# Altium PCB Can_Gauge_PCB.PcbDoc
Units mm, origin at the board's own origin, x right, y up, seen from the top; angles counter-clockwise.
Board outline 55 x 55 mm, 4 copper layers (Top Layer, Int1, Int2, Bottom Layer), stack 1.51 mm thick; 69 components, 52 nets, 259 pads, 96 vias.
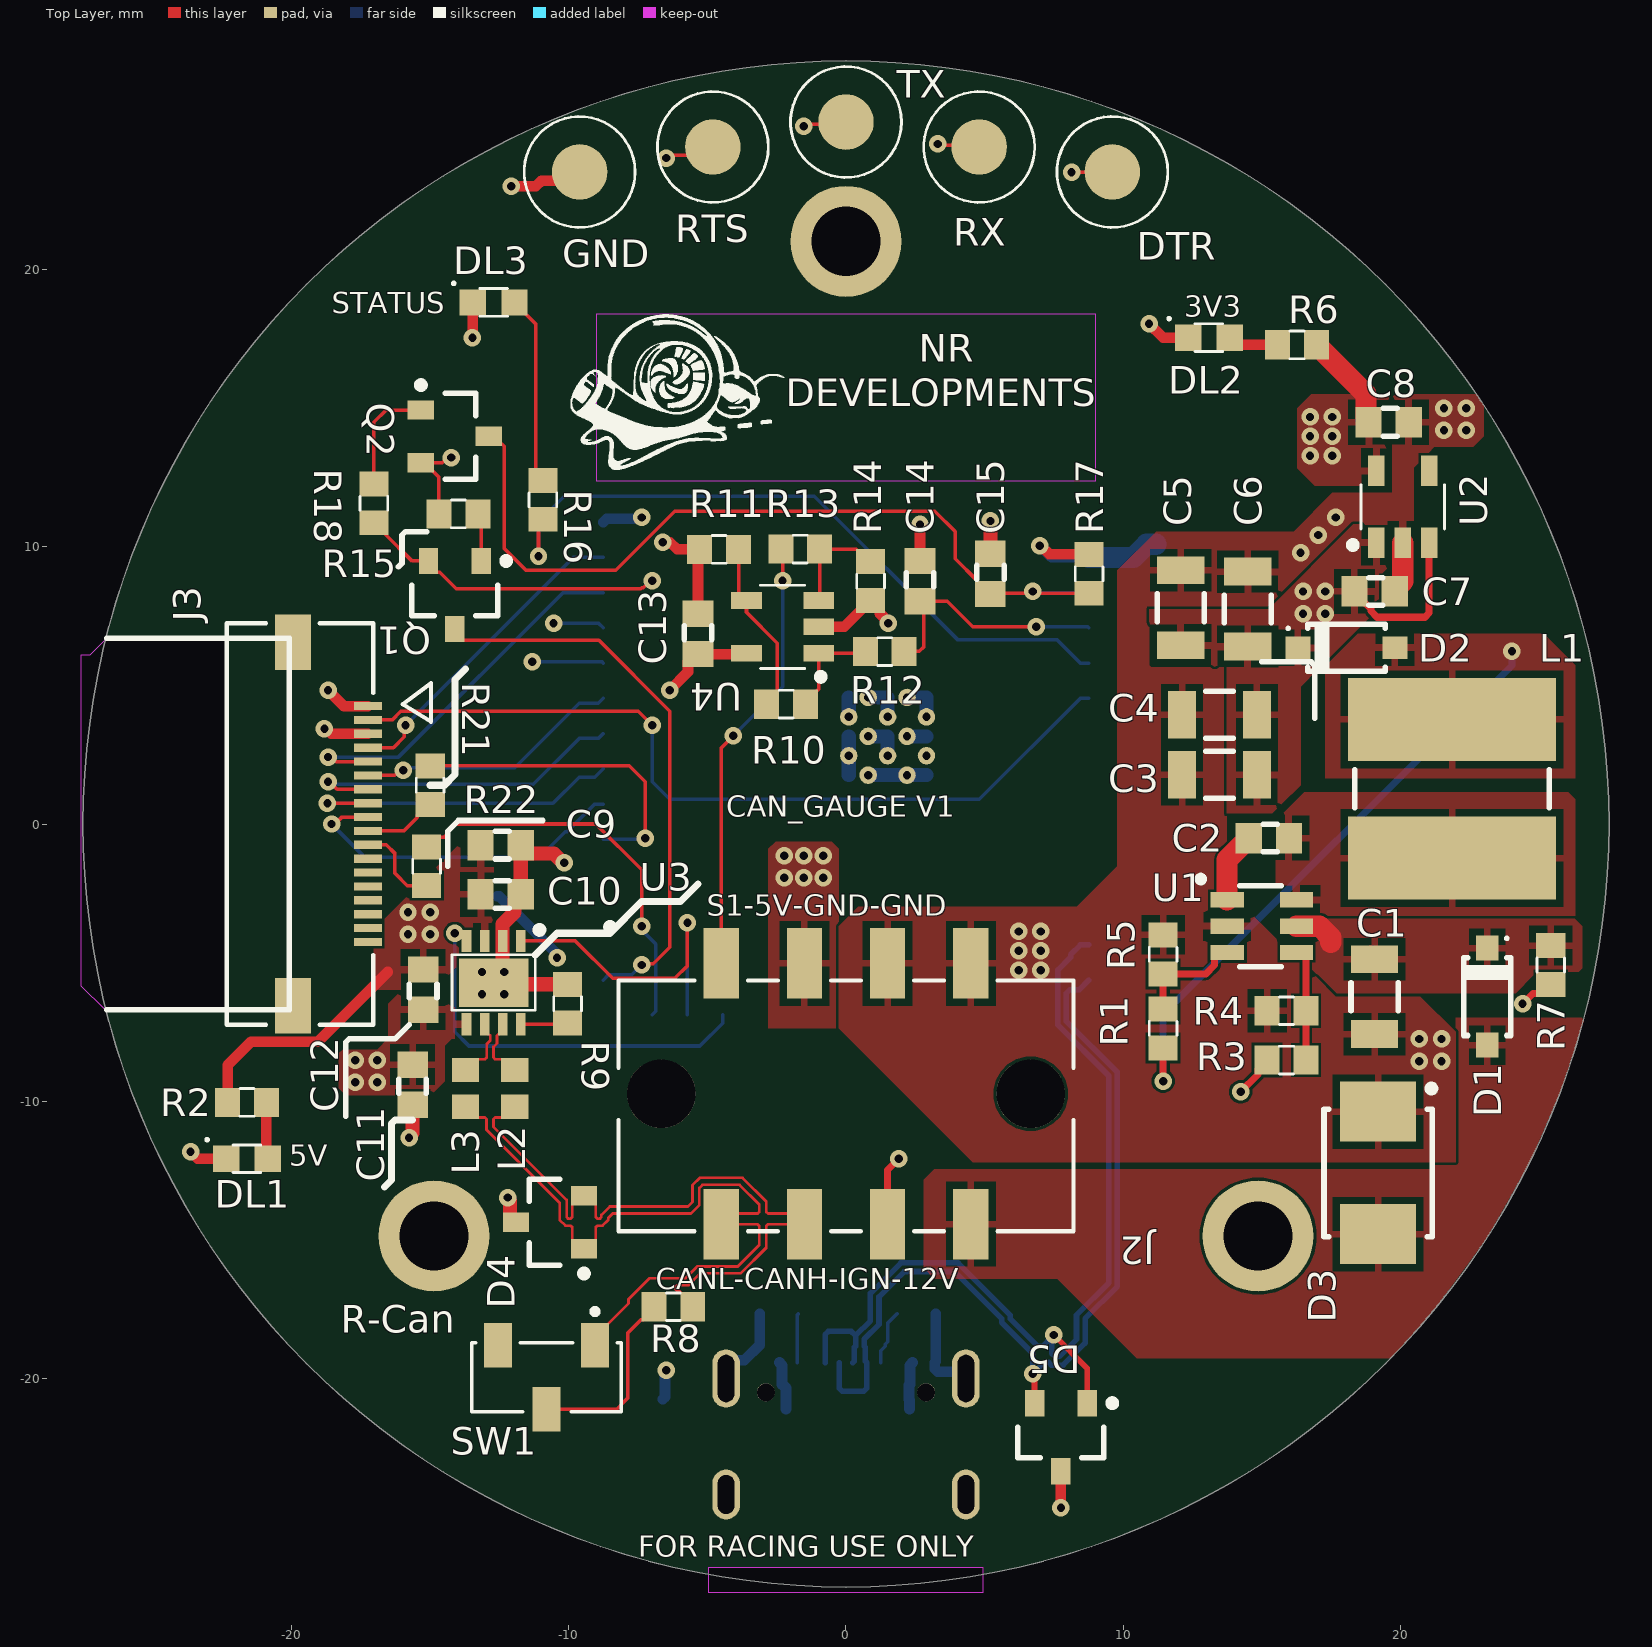
[diagram p0: Top Layer view]
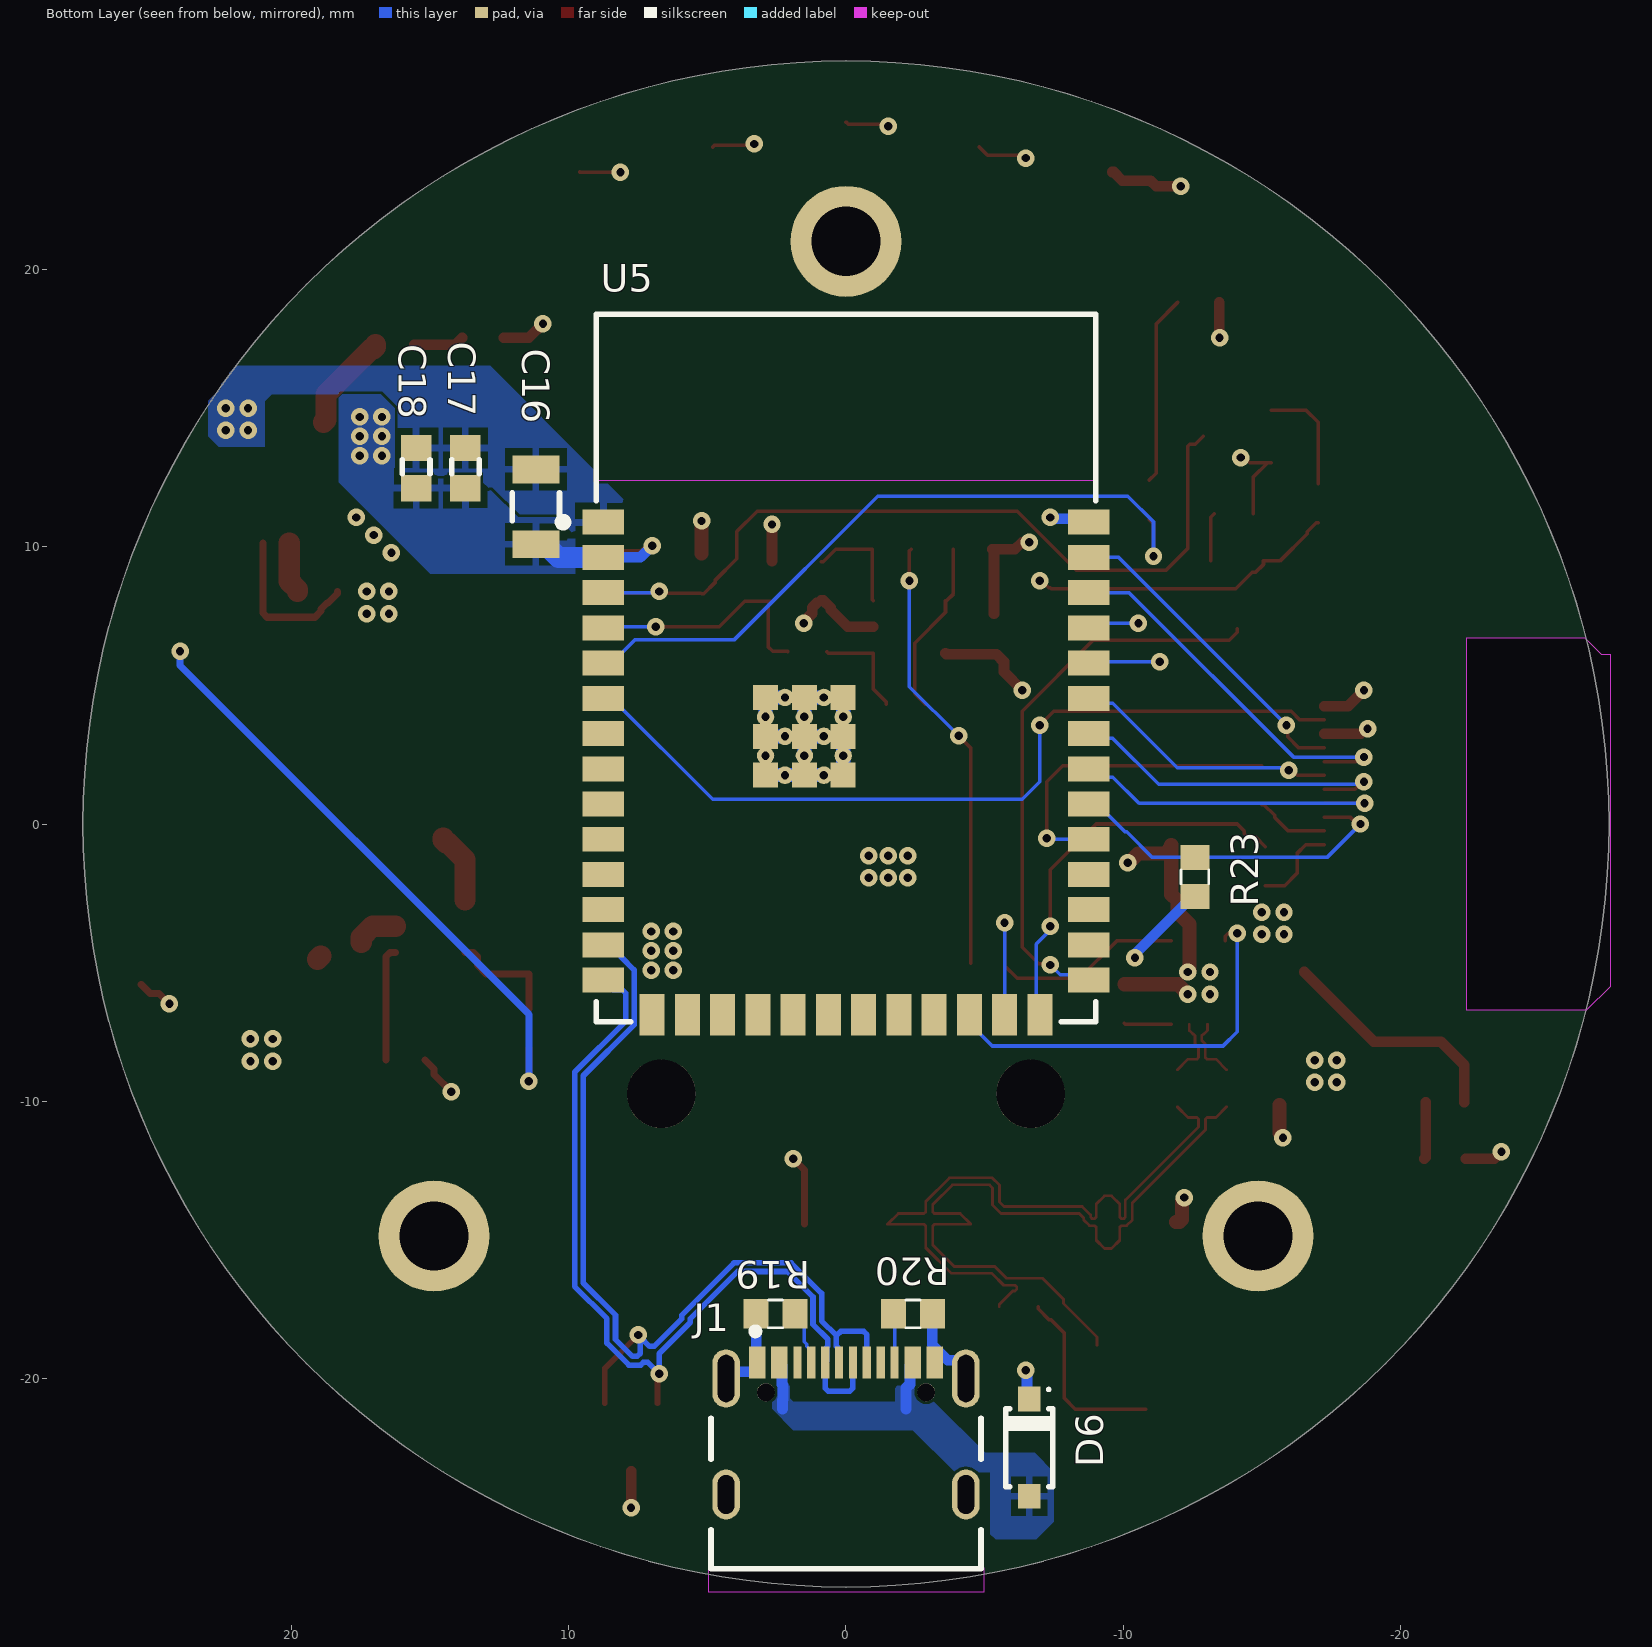
[diagram p1: Bottom Layer view, seen from below]
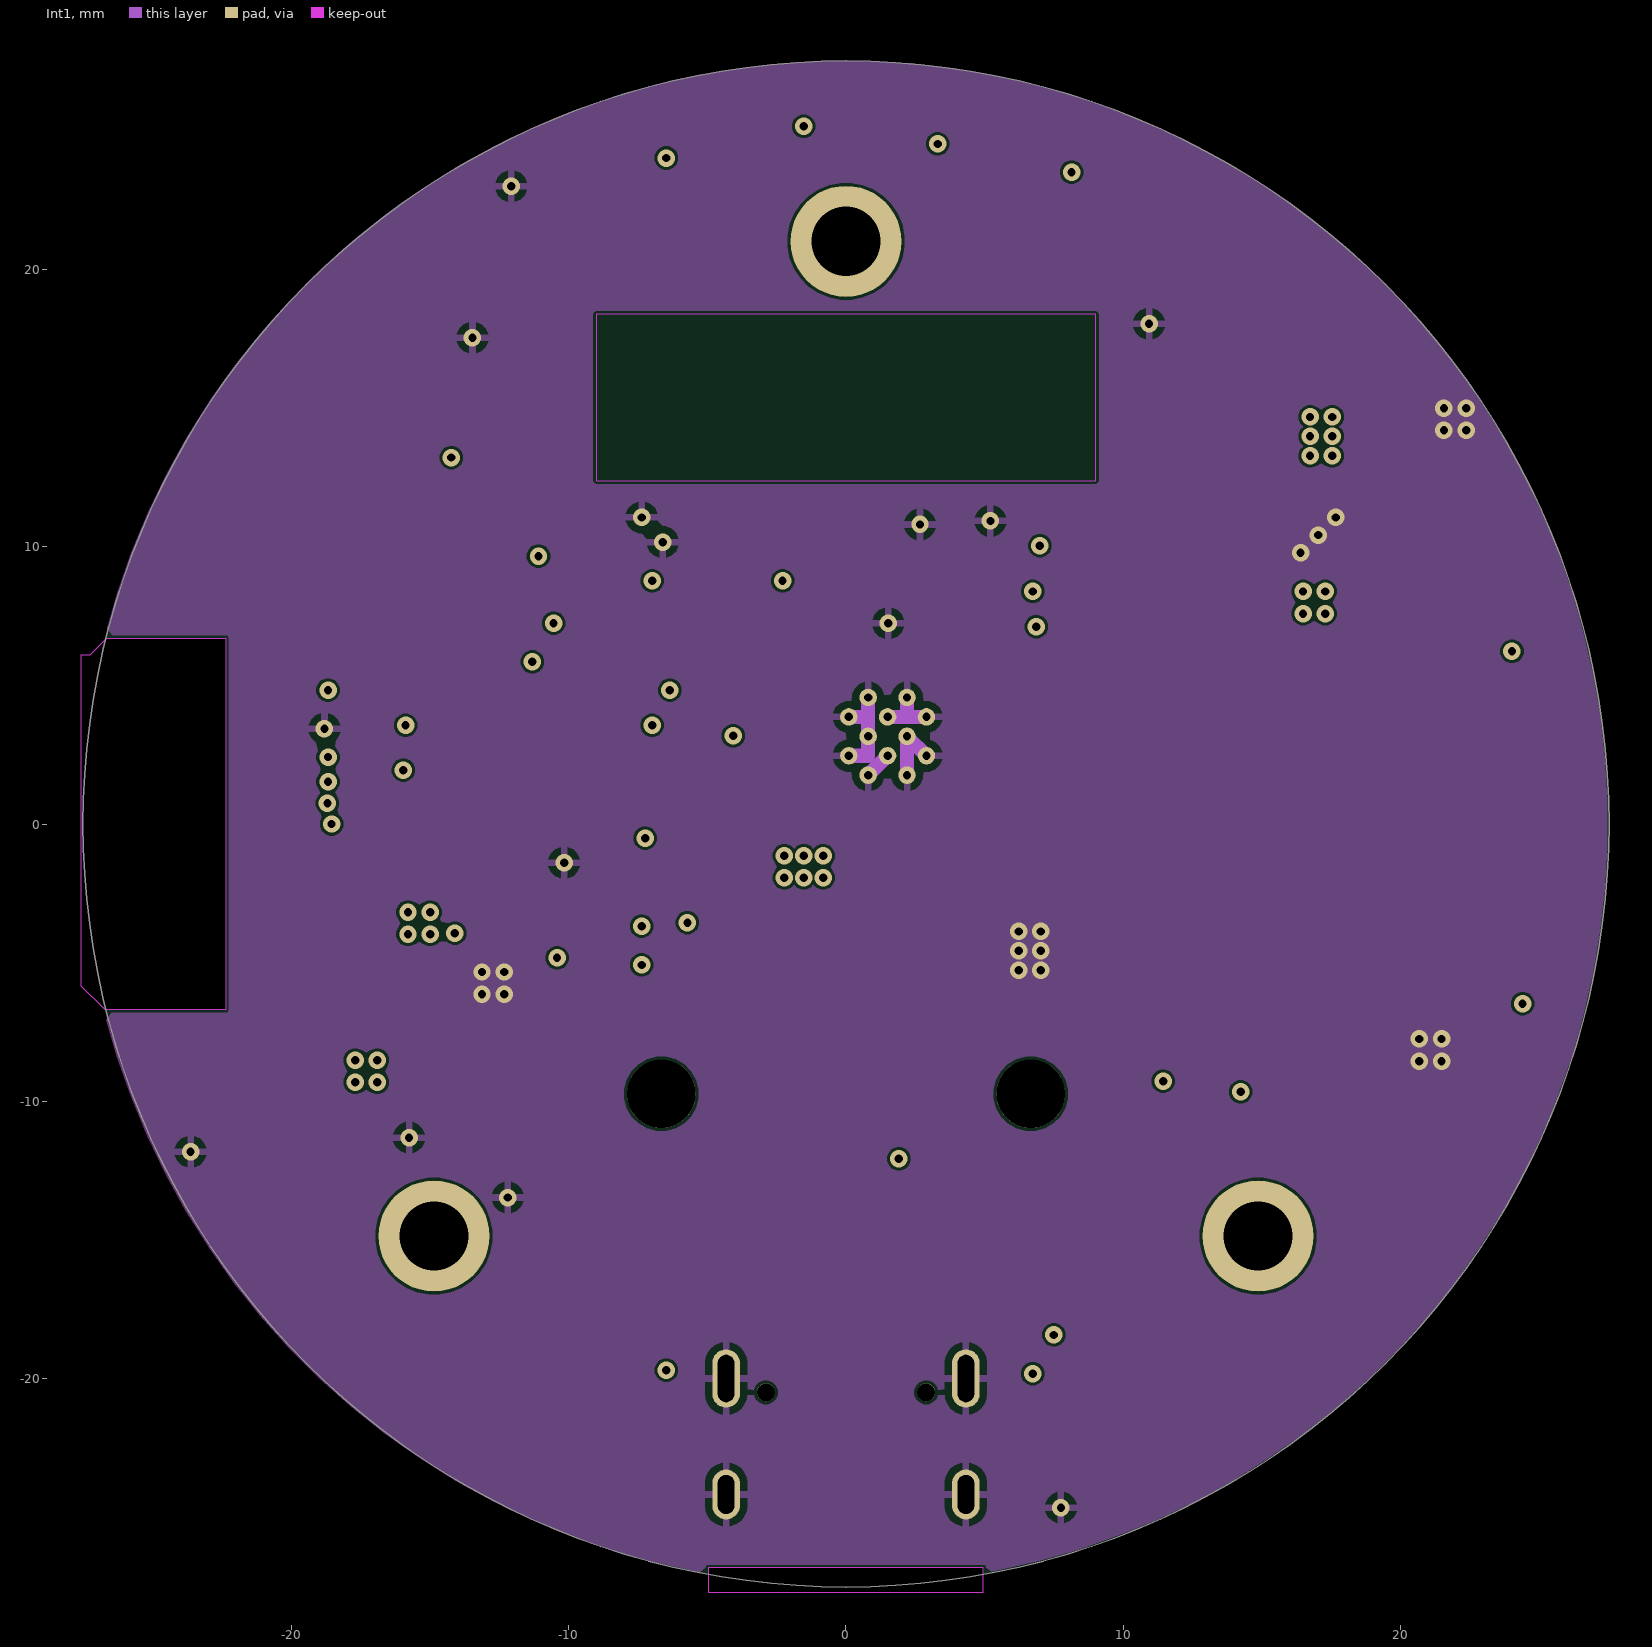
[diagram p2: Int1]
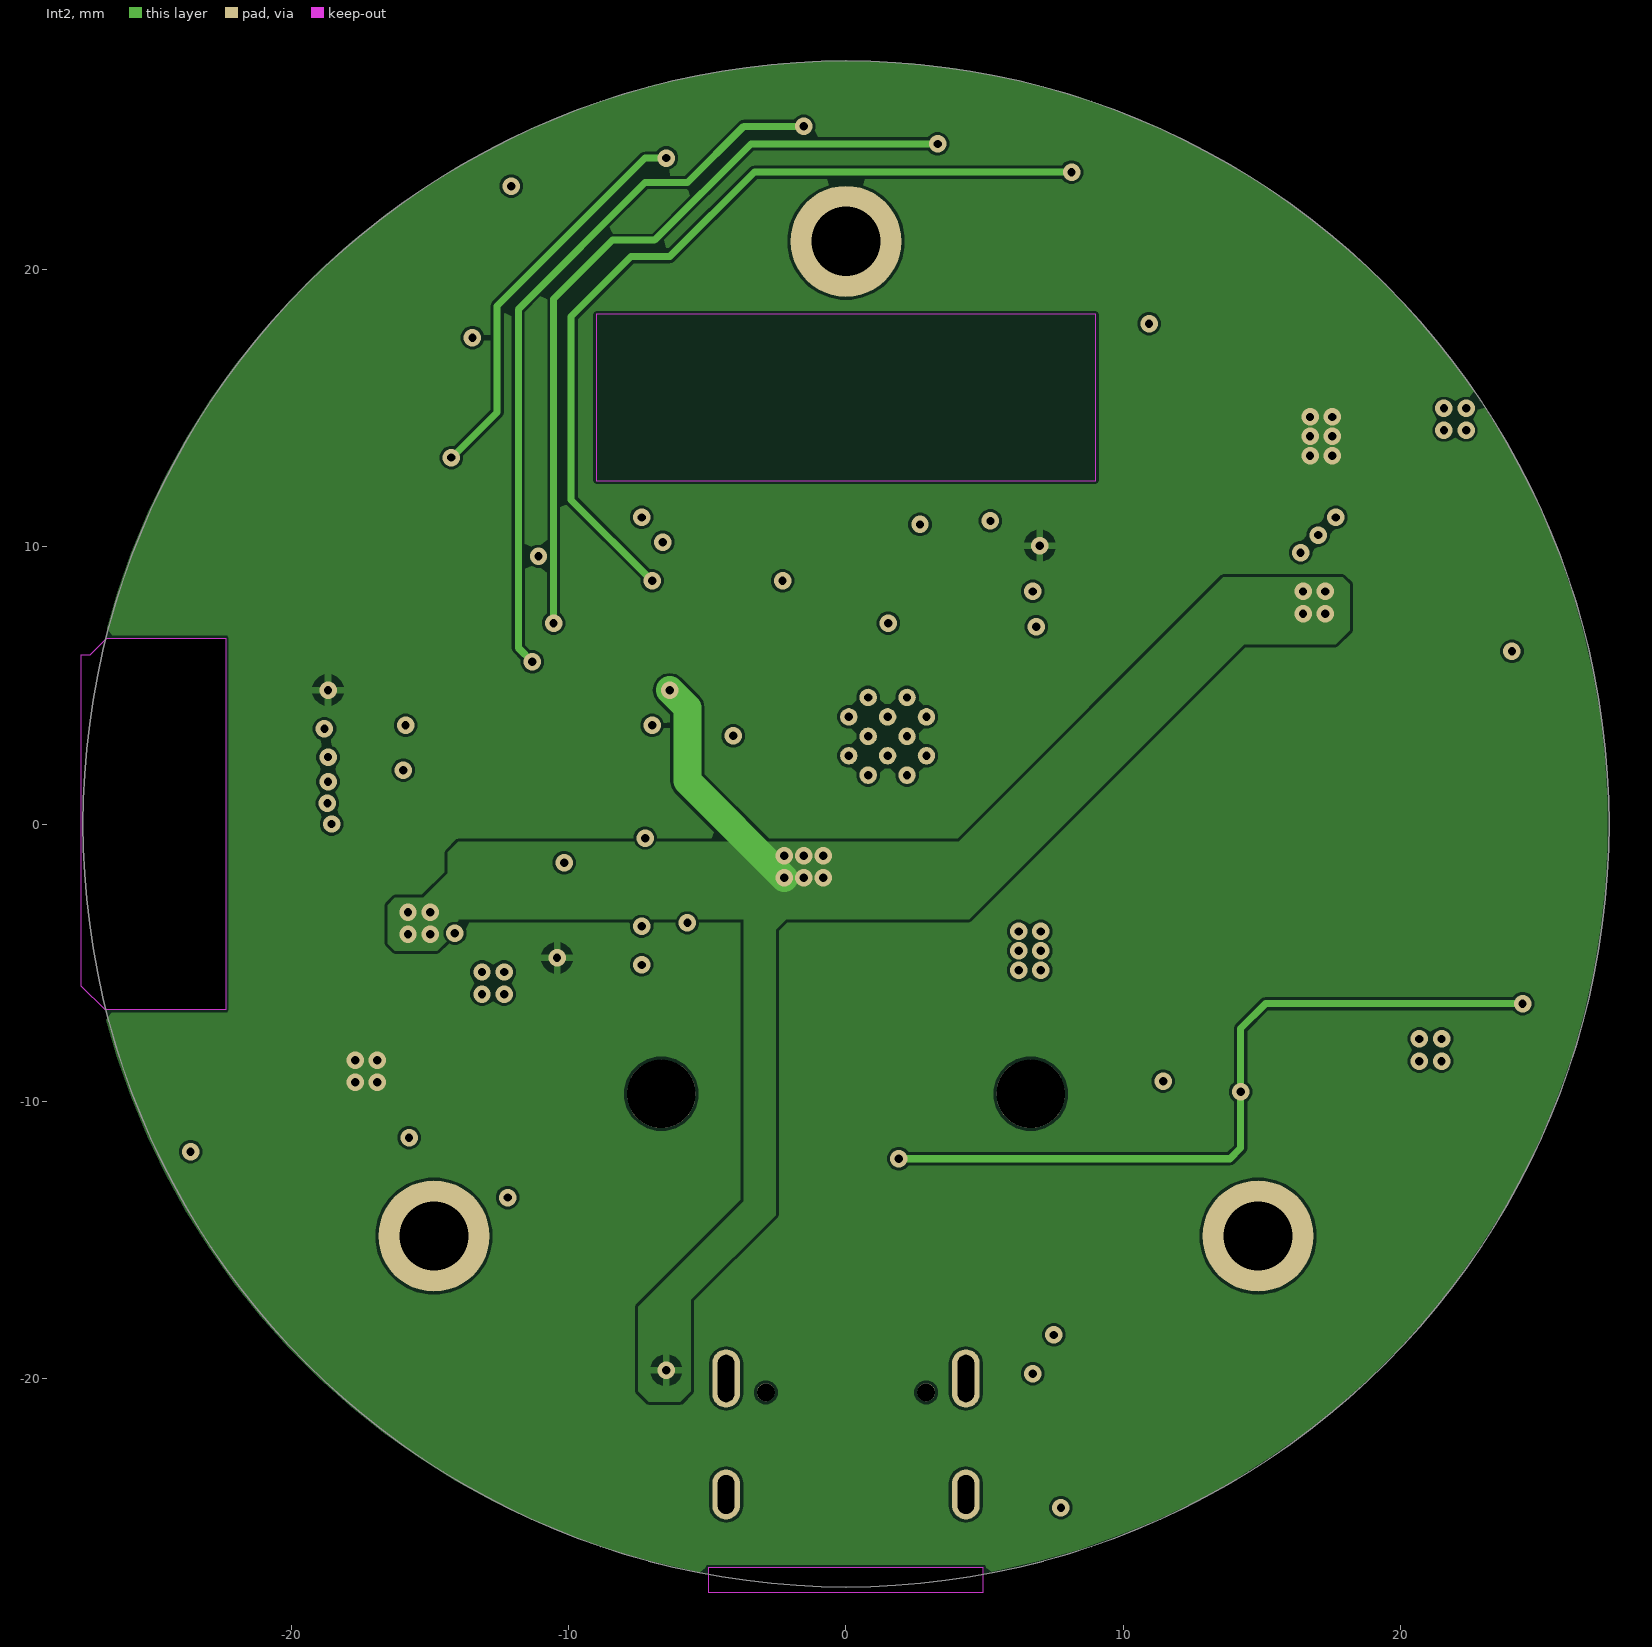
[diagram p3: Int2]
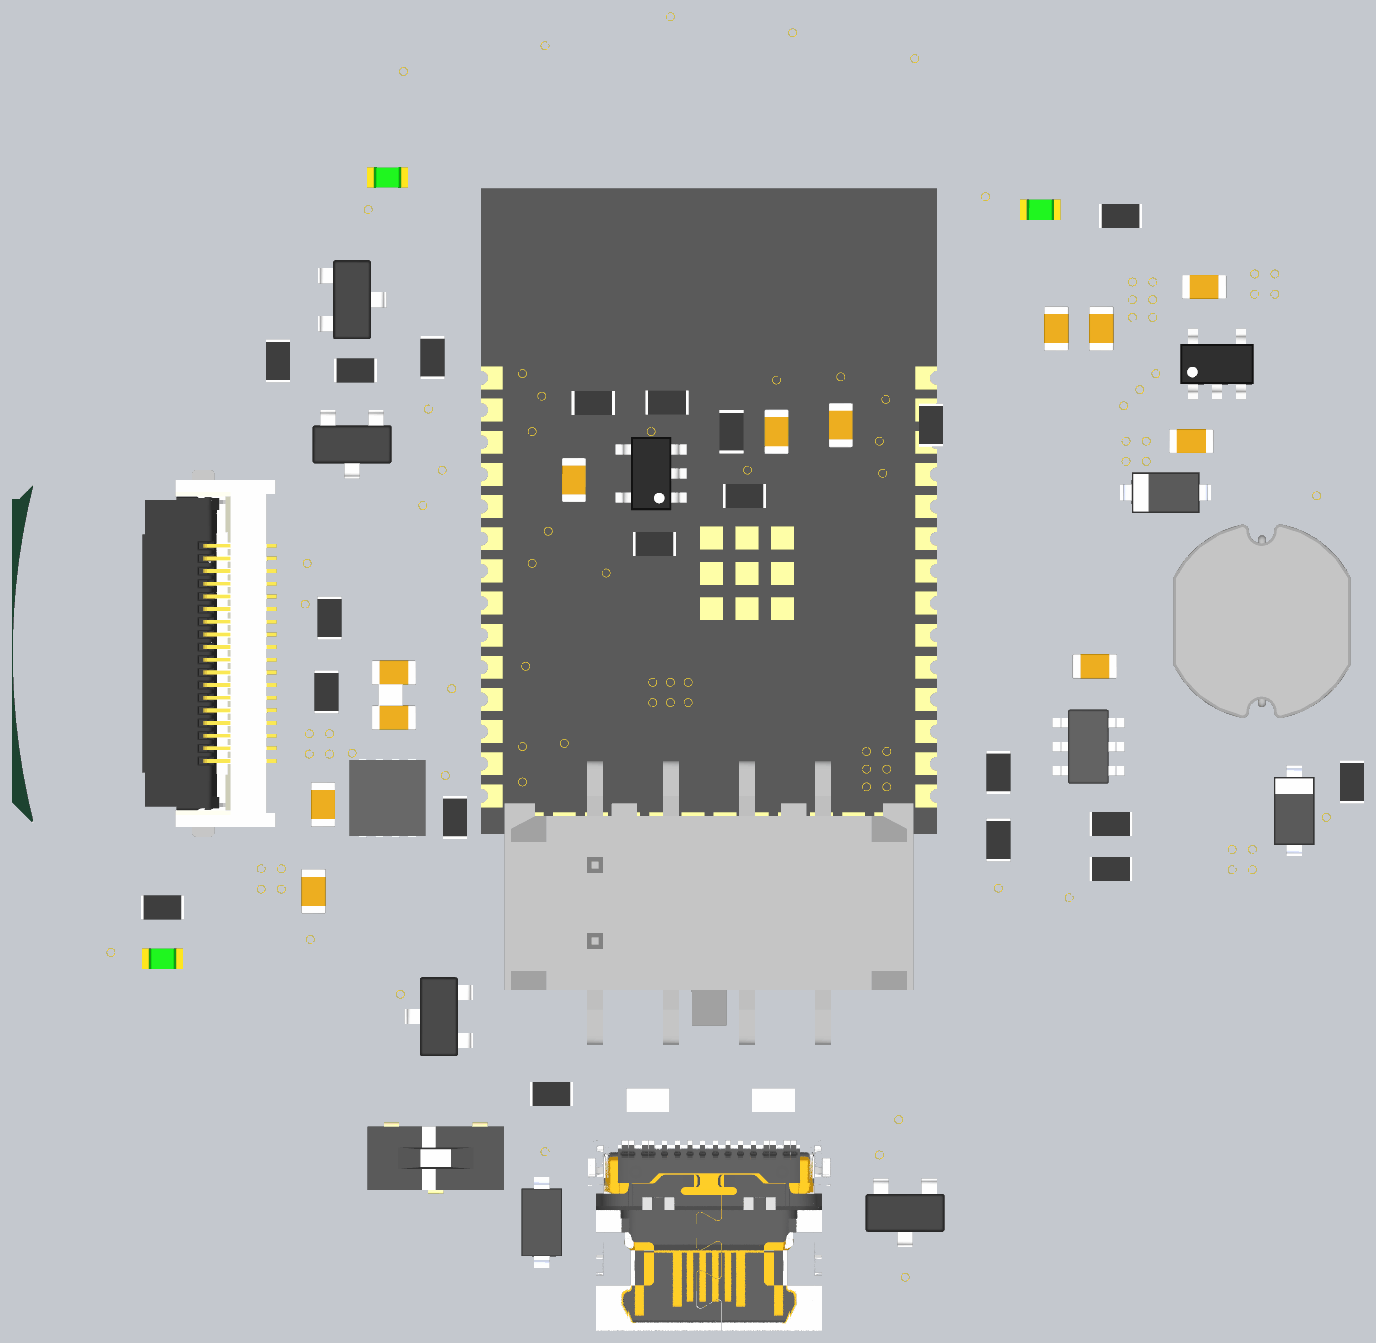
[diagram p4: 3D render of the assembled board from above, using the file's embedded part models]
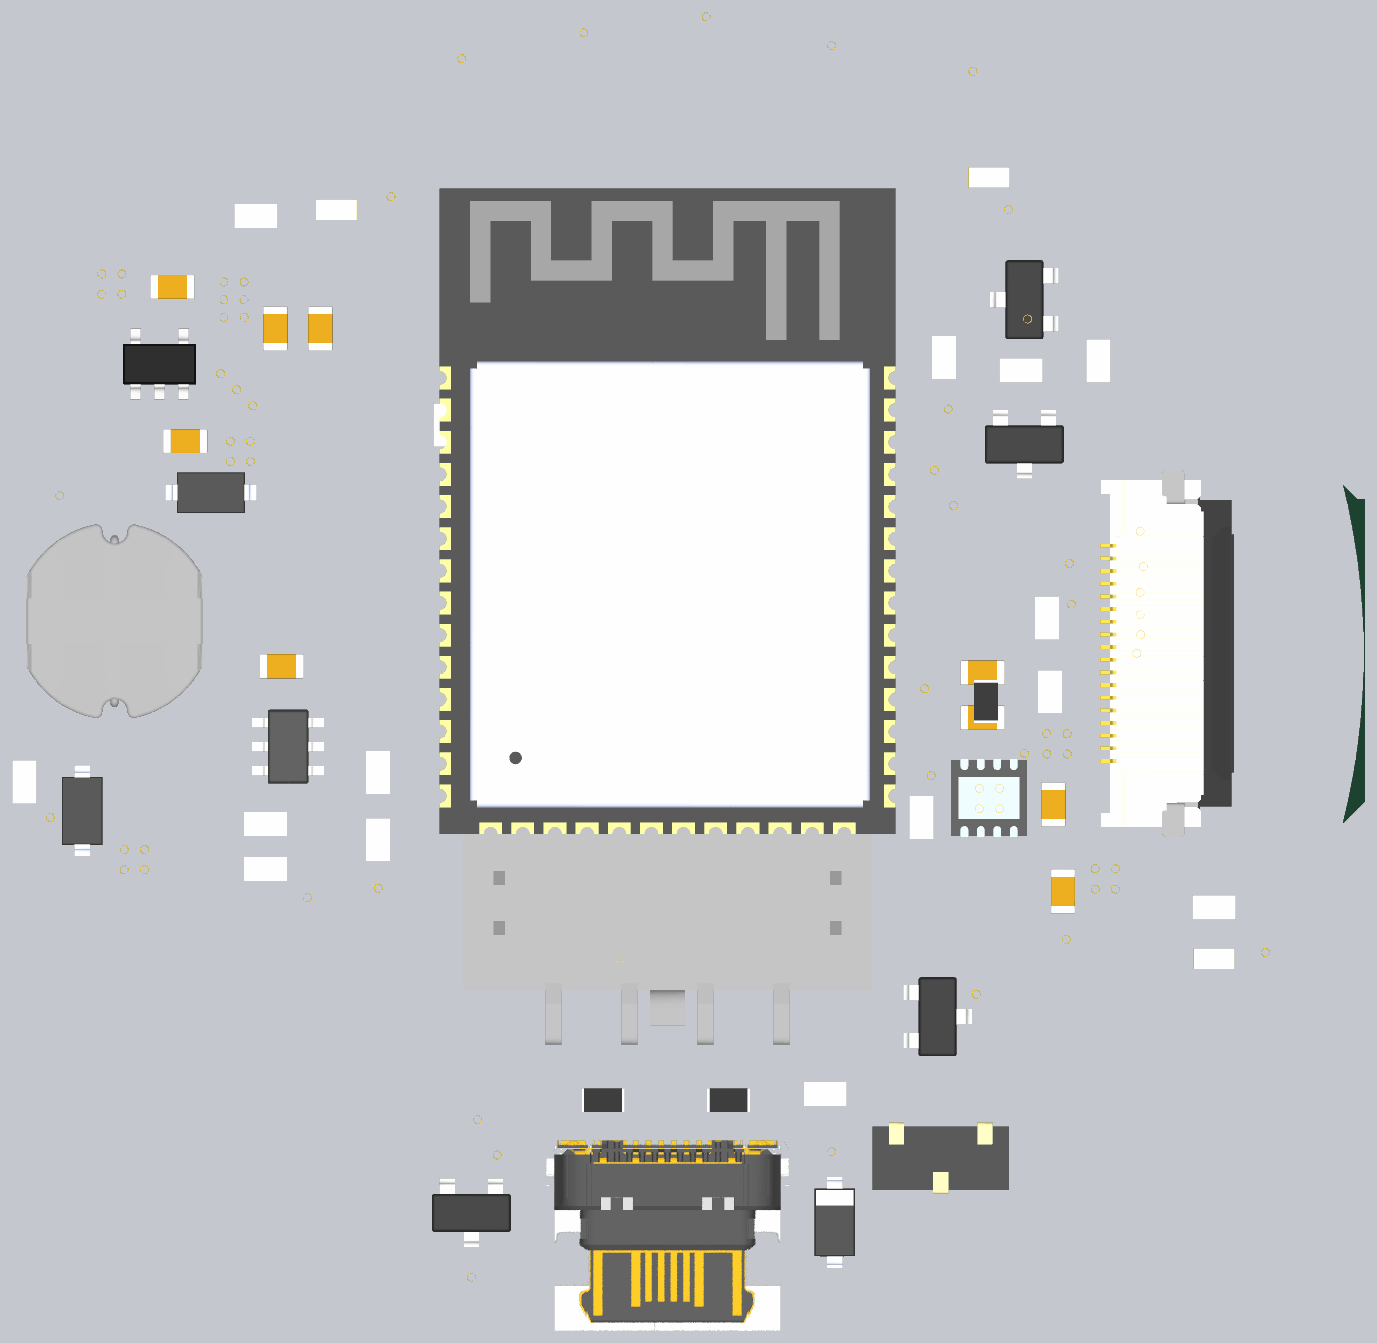
[diagram p5: 3D render of the assembled board from below, using the file's embedded part models]

## Layer stack, top to bottom
Top Solder: solder mask 0.0254, SM-001, Dk 4
Top Layer: signal copper 0.035
Dielectric 1: prepreg 0.125, PP-017, Dk 4.3
Dielectric 2: prepreg 0.125, PP-017, Dk 4.3
Int1: signal copper 0.07
Dielectric 3: core 0.8, Core-039, Dk 4.8
Int2: signal copper 0.07
Dielectric 4: prepreg 0.125, PP-017, Dk 4.3
Dielectric 5: prepreg 0.125, PP-017, Dk 4.3
Bottom Layer: signal copper 0.035
Bottom Solder: solder mask 0.0254, SM-001, Dk 4

## Board outline
-27.5,0 ccw(c0,0) 0,-27.5 ccw(c0,0) 27.5,0 ccw(c0,0) 0,27.5 ccw(c0,0)
cut-out: -4.967,-26.797 -4.967,-27.686 4.953,-27.686 4.953,-26.81 4.94,-26.797
cut-out: -26.639,6.7 -22.352,6.7 -22.352,-6.7 -26.701,-6.7 -27.559,-5.842 -27.559,6.096 -27.243,6.096

## Design rules (kind name [scope] priority, off if disabled: settings)
Clearance [All] p1: gap=0.1 ignorepadtopadclearanceinfootprint=FALSE
DiffPairsRouting CAN [InDifferentialPair('CAN0')] p1: maxlimit=0.5 minlimit=0.151 mostfreqgap=0.5 toplayer_maxgap=0.151 toplayer_prefgap=0.151 toplayer_minwidth=0.1 toplayer_maxwidth=0.1 toplayer_prefwidth=0.1 midlayer1_mingap=0.5 midlayer1_minwidth=0.1 midlayer1_maxwidth=0.1 midlayer1_prefwidth=0.1 midlayer2_mingap=0.5 midlayer2_minwidth=0.1 midlayer2_maxwidth=0.1 midlayer2_prefwidth=0.1 bottomlayer_maxgap=0.151 bottomlayer_prefgap=0.151 bottomlayer_minwidth=0.1 bottomlayer_maxwidth=0.1 bottomlayer_prefwidth=0.1 impedanceprofiledriven=TRUE impedanceprofileid={39625215-853F-41EA-AB77-E748CD0550FE} impedanceprofilevalue=120.000000 maxuncoupledlength=12.7
DiffPairsRouting CAN0 [InDifferentialPair('CAN0_IC')] p2: maxlimit=0.5 minlimit=0.151 mostfreqgap=0.5 toplayer_maxgap=0.151 toplayer_prefgap=0.151 toplayer_minwidth=0.1 toplayer_maxwidth=0.1 toplayer_prefwidth=0.1 midlayer1_mingap=0.5 midlayer1_minwidth=0.1 midlayer1_maxwidth=0.1 midlayer1_prefwidth=0.1 midlayer2_mingap=0.5 midlayer2_minwidth=0.1 midlayer2_maxwidth=0.1 midlayer2_prefwidth=0.1 bottomlayer_maxgap=0.151 bottomlayer_prefgap=0.151 bottomlayer_minwidth=0.1 bottomlayer_maxwidth=0.1 bottomlayer_prefwidth=0.1 impedanceprofiledriven=TRUE impedanceprofileid={39625215-853F-41EA-AB77-E748CD0550FE} impedanceprofilevalue=120.000000 maxuncoupledlength=12.7
DiffPairsRouting USB [InDifferentialPair('MCU_USBD')] p3: maxlimit=0.179 minlimit=0.11 mostfreqgap=0.179 toplayer_maxgap=0.11 toplayer_prefgap=0.11 toplayer_minwidth=0.2 toplayer_maxwidth=0.2 toplayer_prefwidth=0.2 midlayer1_mingap=0.179 midlayer1_minwidth=0.1 midlayer1_maxwidth=0.1 midlayer1_prefwidth=0.1 midlayer2_mingap=0.179 midlayer2_minwidth=0.1 midlayer2_maxwidth=0.1 midlayer2_prefwidth=0.1 bottomlayer_maxgap=0.11 bottomlayer_prefgap=0.11 bottomlayer_minwidth=0.2 bottomlayer_maxwidth=0.2 bottomlayer_prefwidth=0.2 impedanceprofiledriven=TRUE impedanceprofileid={18616970-E0B0-4250-BE95-D12B2F4D1E5C} impedanceprofilevalue=90.000000 maxuncoupledlength=12.7
MinimumSolderMaskSliver [All] p1: minsoldermaskwidth=0.127
PolygonConnect [All] p1: connectstyle=Relief reliefconductorwidth=0.254 reliefentries=4 polygonreliefangle="90 Angle" airgapwidth=0.254
RoutingVias [All] p1: holewidth=0.3 width=0.63 viastyle="Through Hole" minholewidth=0.3 minwidth=0.63 maxholewidth=0.711 maxwidth=1.27
SilkToSilkClearance [All] p1: silktosilkclearance=0.127
SilkToSolderMaskClearance [IsPad] p1: minsilkscreentomaskgap=0 clearancetoexposedcopper=TRUE
SolderMaskExpansion [All] p1: expansion=0 istentingtop=FALSE
SupplyNets "Schematic Supply Nets_5" [InNet('+3V3')] p1: voltage=0.000
SupplyNets "Schematic Supply Nets_4" [InNet('+12VPRT')] p2: voltage=0.000
SupplyNets "Schematic Supply Nets_3" [InNet('IGNITION')] p3: voltage=0.000
SupplyNets "Schematic Supply Nets_2" [InNet('+12V')] p4: voltage=0.000
SupplyNets "Schematic Supply Nets_1" [InNet('5V')] p5: voltage=0.000
SupplyNets "Schematic Supply Nets" [InNet('GND')] p6: voltage=0.000
Width [All] p1: maxlimit=1.27 minlimit=0.127 preferedwidth=0.254 midlayer1_minwidth=0.254 midlayer2_minwidth=0.254 minimp=50.000000 maximp=50.000000 favimp=50.000000
26 further rules are at their usual default settings.

## Classes and differential pairs
component class Display: J3 R21 R22
component class Connector: J2
component class Sensor: C13 C14 R10 R11 R12 R13 R14 U4
component class PWR: C1 C2 C3 C4 C5 C6 C7 C8 D1 D2 D3 DL1 DL2 L1 R1 R2 R3 R4 R5 R6 R7 U1 U2
component class Mcu: C15 C16 C17 C18 D5 D6 DL3 J1 Q1 Q2 R15 R16 R17 R18 R19 R20 R23 TP1 TP2 TP3 TP4 TP5 U5
component class CAN: C9 C10 C11 C12 D4 L2 L3 R8 R9 SW1 U3
differential pair MCU_USBD: +MCU_USBD_P -MCU_USBD_N
differential pair CAN0_IC: +CAN0_IC_P -CAN0_IC_N
differential pair CAN0: +CAN0_P -CAN0_N

## Components (designator, comment, footprint, x,y, rotation, side; value= is the part's Value field where it differs from the comment)
C1 "CAP" CAPC3216X16M 19.05,-6.223 r270 top value=2u2
C2 "CAP" CAPC1608X09M 15.24,-0.508 r0 top value=100n
C3 "CAP" CAPC3216X16M 13.462,1.778 r180 top value=10u
C4 "CAP" CAPC3216X16M 13.462,3.937 r180 top value=10u
C5 "CAP" CAPC3216X16M 12.065,7.794 r90 top value=10u
C6 "CAP" CAPC3216X16M 14.478,7.747 r90 top value=10u
C7 "CAP" CAPC1608X09M 19.05,8.382 r0 top value=1u
C8 "CAP" CAPC1608X09M 19.558,14.478 r0 top value=1u
C9 "C0603C104K5RACTU" CAPC1608X09M -12.446,-0.762 r0 top value=100n
C10 "C0603X473K5RAC3316" CAPC1608X09M -12.446,-2.54 r0 top value=47n
C11 "C0603C104K5RACTU" CAPC1608X09M -15.621,-9.398 r270 top value=100n
C12 "C0603C104K5RACTU" CAPC1608X09M -15.24,-5.969 r270 top value=100n
C13 "C0603C104K5RACTU" CAPC1608X09M -5.334,6.85 r90 top value=100n
C14 "" CAPC1608X09M 2.667,8.755 r90 top
C15 "C0603C105K8RACTU" CAPC1608X09M 5.207,9.017 r90 top value=1u
C16 "GCJ31CR71A106MA13L" CAPC3216X16M 11.176,11.43 r90 bottom value=10u
C17 "C0603C104K5RACTU" CAPC1608X09M 13.716,12.827 r90 bottom value=100n
C18 "C0603C104K5RACTU" CAPC1608X09M 15.494,12.827 r90 bottom value=100n
D1 "Diode_Schottky" "SODFL360X130-2M -AC" 23.114,-6.223 r270 top value=1N5819HW-7-F
D2 "Diode_Schottky" "SODFL360X130-2M -AC" 18.034,6.35 r0 top value=1N5819HW-7-F
D3 "Diode" ONSC-SMB-2 19.177,-12.573 r270 top value=SMBJ18CAe3/TR13
D4 "SM712-02HTG" SOT95P240X120-3N -10.668,-14.351 r180 top value=SZNUP2105LT1G
D5 "SM712-02HTG" SOT95P240X120-3N 7.747,-22.098 r270 top value=SM712.TCT
D6 "Diode_Schottky" "SODFL360X130-2M -AC" -6.604,-22.479 r270 bottom value=1N5819HW-7-F
DL1 "LED_Green" LED0603 -21.59,-12.065 r0 top value=150060GS75000
DL2 "LED_Green" LED0603 13.081,17.526 r0 top value=150060GS75000
DL3 "150060BS75000" LED0603 -12.7,18.796 r0 top
DTR "Test_Point" TP_c200 9.6,23.5 r0 top (schematic designator TP5)
GND "Test_Point" TP_c200 -9.6,23.5 r0 top (schematic designator TP1)
J1 "USB4105-GF-A" GCT-USB4105-GF-A 0,-23 r180 bottom
J2 "MOLEX_43045-0817" MOLEX_430450817 0,-10.16 r180 top value=43045-0817
J3 "MOLEX_5051101892" MOLEX_5051101892 -19.68,0 r270 top value=5051101892
L1 "IND" BOURNS_SDE0805A 21.844,1.27 r90 top value=18u
L2 "BLM18HB331SN1D" INDC1608X09N -11.938,-9.525 r270 top value=MMZ1608Q331BTD25
L3 "BLM18HB331SN1D" INDC1608X09N -13.716,-9.525 r270 top value=MMZ1608Q331BTD25
Q1 "BVSS138LT1G" "SOT95P240X120-3N - GDS" -14.097,8.255 r270 top value=NX7002AKVL
Q2 "BVSS138LT1G" "SOT95P240X120-3N - GDS" -14.097,13.97 r0 top value=NX7002AKVL
R1 "Res" RESC1608X06M 11.43,-7.366 r270 top value=88K7
R2 "Res" RESC1608X06M -21.59,-10.033 r180 top value=1K3
R3 "Res" RESC1608X06M 15.875,-8.509 r0 top value=10K
R4 "Res" RESC1608X06M 15.875,-6.731 r0 top value=10K
R5 "Res" RESC1608X06M 11.43,-4.699 r270 top value=22K1
R6 "Res" RESC1608X06M 16.256,17.272 r0 top value=560R
R7 "Res" RESC1608X06M 25.4,-5.08 r270 top value=0R
R8 "CRCW0603120RFKEA" RESC1608X06M -6.223,-17.399 r180 top value=120R
R9 "CRCW060310K0FKEA" RESC1608X06M -10.033,-6.477 r270 top value=10K
R10 "CRCW060310K0FKEA" RESC1608X06M -2.159,4.318 r180 top value=10K
R11 "CRCW060315K0FKEC" RESC1608X06M -4.572,9.898 r180 top value=15K
R12 "CRCW06030000Z0EAC" RESC1608X06M 1.397,6.215 r0 top value=0R
R13 "CRCW060315K0FKEC" RESC1608X06M -1.651,9.906 r0 top value=15K
R14 "CRCW060310K0FKEA" RESC1608X06M 0.889,8.755 r90 top value=10K
R15 "CRCW060310K0FKEA" RESC1608X06M -13.97,11.176 r180 top value=10K
R16 "RC0603FR-07560RL" RESC1608X06M -10.922,11.684 r270 top value=560R
R17 "CRCW060310K0FKEA" RESC1608X06M 8.763,9.017 r90 top value=10K
R18 "CRCW060310K0FKEA" RESC1608X06M -17.018,11.557 r270 top value=10K
R19 "Resistor" RESC1608X06M 2.54,-17.653 r180 bottom value=5K1
R20 "Resistor" RESC1608X06M -2.413,-17.653 r0 bottom value=5K1
R21 "CRCW06030000Z0EAC" RESC1608X06M -14.986,1.397 r270 top value=0R
R22 "CRCW06030000Z0EAC" RESC1608X06M -15.113,-1.524 r270 top value=0R
R23 "CRCW060310K0FKEA" RESC1608X06M -12.573,-1.905 r270 bottom value=10K
RTS "Test_Point" TP_c200 -4.8,24.4 r0 top (schematic designator TP2)
RX "Test_Point" TP_c200 4.8,24.4 r0 top (schematic designator TP4)
SW1 "Switch SPDT" SW_CJS-1200TA -10.795,-19.939 r180 top value=CJS-1200TA
TX "Test_Point" TP_c200 0,25.3 r0 top (schematic designator TP3)
U1 "DC DC" SOT95P280X145-6N 14.986,-3.683 r0 top value=LV3842XDBVR
U2 "TLV75530PDBVR" SOT95P280X145-5N 20.066,11.43 r90 top value=TLV75533PDBVR
U3 "TJA1051TK/3,118" SON65P300X300X100-9N-D -12.7,-5.715 r270 top
U4 "TLV900" SOT95P280X145-5N -2.286,7.104 r180 top value=TLV9001IDBVR
U5 "ESP32-S3-WROOM-1-N" ESPRESSIF_ESP32-S3-WROOM-1-N 0,2 r180 bottom locked value=ESP32-S3-WROOM-1-N8R8

## Footprints (in the part's own frame and the unit in brackets; to place one, negate y for a bottom-side part, rotate by r counter-clockwise, add the part's x,y. Pads: shape width x height; smd on the part's side, far side on the other; paste and mask are expansions set on the pad)
BOURNS_SDE0805A [mm]
  rect 3x7.5 smd: 1(-2.5,0) 2(2.5,0)
  silkscreen extent -0.68,-3.5 0.68,3.5, body extent -3.83,-3.5 3.83,3.5, height 5
CAPC1608X09M [mm] "Chip Capacitor, 2-Leads, Body 1,60x0,80mm, IPC Low Density"
  rect 0.95x1.1 smd: 1(-0.725,0) 2(0.725,0)
  silkscreen extent -0.2,-0.5 0.3,0.5, body extent -0.87,-0.48 0.87,0.48, height 0.92
CAPC3216X16M [mm] "Chip Capacitor, 2-Leads, Body 3,20x1,60mm, IPC Low Density"
  rect 1x1.7 smd: 1(-1.35,0) 2(1.35,0)
  silkscreen extent -0.5,-0.85 0.5,0.85, body extent -1.7,-0.9 1.7,0.9, height 1.6
ESPRESSIF_ESP32-S3-WROOM-1-N [mm] "Bluetooth, WiFi 802.11b/g/n, Bluetooth v5.0 Transceiver Module 2.4GHz PCB Trace Surface Mount"
  rect 1.5x0.9 smd: 1(-8.75,8.88) 2(-8.75,7.61) 3(-8.75,6.34) 4(-8.75,5.07) 5(-8.75,3.8) 6(-8.75,2.53) 7(-8.75,1.26) 8(-8.75,-0.01) 9(-8.75,-1.28) 10(-8.75,-2.55) 11(-8.75,-3.82) 12(-8.75,-5.09) 13(-8.75,-6.36) 14(-8.75,-7.63) 27(8.75,-7.63) 28(8.75,-6.36) 29(8.75,-5.09) 30(8.75,-3.82) 31(8.75,-2.55) 32(8.75,-1.28) 33(8.75,-0.01) 34(8.75,1.26) 35(8.75,2.53) 36(8.75,3.8) 37(8.75,5.07) 38(8.75,6.34) 39(8.75,7.61) 40(8.75,8.88)
  rect 0.9x1.5 smd: 15(-6.985,-8.88) 16(-5.715,-8.88) 17(-4.445,-8.88) 18(-3.175,-8.88) 19(-1.905,-8.88) 20(-0.635,-8.88) 21(0.635,-8.88) 22(1.905,-8.88) 23(3.175,-8.88) 24(4.445,-8.88) 25(5.715,-8.88) 26(6.985,-8.88)
  rect 0.9x0.9 smd: 41(-2.9,-0.24) 41(-2.9,1.16) 41(-2.9,2.56) 41(-1.5,-0.24) 41(-1.5,1.16) 41(-1.5,2.56) 41(-0.1,-0.24) 41(-0.1,1.16) 41(-0.1,2.56)
  round 0.63 hole 0.3 mask+0: 41_10(-1.5,1.86) 41_11(-2.9,1.86) 41_12(-0.1,1.86) 41_13(-2.9,0.46) 41_14(-1.5,0.46) 41_15(-0.1,0.46) 41_16(-2.2,2.56) 41_17(-0.8,2.56) 41_18(-2.2,1.16) 41_19(-0.8,1.16) 41_20(-2.2,-0.24) 41_21(-0.8,-0.24)
  Keep-Out Layer region: 9,10.37 -9,10.37 -9,16.37 9,16.37
  Keep-Out Layer region: 9,10.37 -9,10.37 -9,16.37 9,16.37
  silkscreen extent -10.3,-9.13 9,16.37, body extent -9,-9.13 9,16.37, height 3.25
GCT-USB4105-GF-A [mm]
  rrect100% 1x2.1 hole 1.7 slot 0.6 at 0 deg paste-2539.97 mask+0: 1(-4.32,3.015) 2(4.32,3.015)
  rrect100% 1x1.8 hole 1.4 slot 0.6 at 0 deg paste-2539.97 mask+0: 3(-4.32,-1.165) 4(4.32,-1.165)
  rect 0.6x1.15 smd paste+0 mask+0: A1-B12(-3.2,3.59) A4-B9(-2.4,3.59) B1-A12(3.2,3.59) B4-A9(2.4,3.59)
  rect 0.3x1.15 smd paste+0 mask+0: A5(-1.25,3.59) A6(-0.25,3.59) A7(0.25,3.59) A8(1.25,3.59) B5(1.75,3.59) B6(0.75,3.59) B7(-0.75,3.59) B8(-1.75,3.59)
  round 0.65 hole 0.65 unplated paste-2539.97 mask+0: ""(-2.89,2.515) ""(2.89,2.515)
  silkscreen extent -4.86,-3.84 4.86,4.84, body extent -4.79,-3.76 4.79,3.77, height 3.26
INDC1608X09N [mm] "L 0603"
  rect 0.87x0.98 smd: 1(-0.665,0) 2(0.665,0)
  body extent -0.87,-0.48 0.87,0.47, height 0.95
LED0603 [mm] "Chip Diode, 2-Leads, Body 0603"
  rect 0.95x0.95 smd: A(0.75,0) C(-0.75,0)
  silkscreen extent -1.49,-0.5 0.5,0.74, body extent -0.81,-0.4 0.81,0.4, height 1.11
MOLEX_430450817 [mm]
  rect 1.27x2.54 smd paste+0 mask+0.102: 1(4.5,-5.136) 2(1.5,-5.136) 3(-1.5,-5.136) 4(-4.5,-5.136) 5(4.5,4.264) 6(1.5,4.264) 7(-1.5,4.264) 8(-4.5,4.264)
  round 2.464 hole 2.464 unplated mask+0.102: 9(-6.655,-0.432) 10(6.655,-0.432)
  silkscreen extent -8.2,-6.57 8.62,4.52, body extent -8.08,-5.91 8.08,5.29, height 9.96
MOLEX_5051101892 [mm]
  rect 0.3x1 smd: 1(-4.25,2.45) 2(-3.75,2.45) 3(-3.25,2.45) 4(-2.75,2.45) 5(-2.25,2.45) 6(-1.75,2.45) 7(-1.25,2.45) 8(-0.75,2.45) 9(-0.25,2.45) 10(0.25,2.45) 11(0.75,2.45) 12(1.25,2.45) 13(1.75,2.45) 14(2.25,2.45) 15(2.75,2.45) 16(3.25,2.45) 17(3.75,2.45) 18(4.25,2.45)
  rect 2x1.3 smd: P1(-6.55,-0.25) P2(6.55,-0.25)
  silkscreen extent -7.24,-2.64 7.24,4.72, body extent -7.25,-2.7 7.25,2.6, height 1.9
ONSC-SMB-2 [mm] "SOJ, 2-Leads, Body 4.57x3.81mm"
  rect 2.159x2.743 smd: 1(-2.21,0) 2(2.21,0)
  silkscreen extent -3.16,-1.95 2.3,2.05, body extent -2.29,-1.91 2.28,1.91, height 2.52
RESC1608X06M [mm] "Chip Resistor, 2-Leads, Body 1,60x0,82mm, IPC Low Density"
  rect 0.9x1.05 smd: 1(-0.7,0) 2(0.7,0)
  silkscreen extent -0.25,-0.5 0.25,0.5, body extent -0.85,-0.47 0.85,0.48, height 0.55
"SODFL360X130-2M -AC" [mm] "SODFL, 2-Leads, Body 1,60x3,60mm, IPC Low Density"
  rect 0.9x0.8 smd: A(1.75,0) C(-1.75,0)
  silkscreen extent -2.15,-0.85 1.4,0.85, body extent -1.8,-0.8 1.8,0.8, height 1.3
SON65P300X300X100-9N-D [mm]
  rect 0.8x0.35 smd: 1(-1.5,0.975) 2(-1.5,0.325) 3(-1.5,-0.325) 4(-1.5,-0.975) 5(1.5,-0.975) 6(1.5,-0.325) 7(1.5,0.325) 8(1.5,0.975)
  rect 1.75x2.5 smd: 9(0,0)
  silkscreen extent -2.02,-1.5 1,1.78, body extent -1.55,-1.5 1.55,1.5, height 1
SOT95P240X120-3N [mm] "SOT23, 3-Leads, Body 2,92x2,40mm, Pitch 0,95mm, IPC Medium Density"
  rect 0.95x0.7 smd: 1(-1.225,0.95) 2(-1.225,-0.95) 3(1.225,0)
  silkscreen extent -1.35,-1.55 0.75,1.97, body extent -1.35,-1.56 1.35,1.56, height 1.2
"SOT95P240X120-3N - GDS" [mm] "SOT23, 3-Leads, Body 2,92x2,40mm, Pitch 0,95mm, IPC Medium Density"
  rect 0.95x0.7 smd: D(1.225,0) G(-1.225,0.95) S(-1.225,-0.95)
  silkscreen extent -1.35,-1.55 0.75,1.98, body extent -1.35,-1.56 1.35,1.56, height 1.2
SOT95P280X145-5N [mm] "SOT23, 5-Leads, Body 3,13x2,80mm, Pitch 0,95mm, IPC Medium Density"
  rect 1.1x0.6 smd: 1(-1.3,0.95) 2(-1.3,0) 3(-1.3,-0.95) 4(1.3,-0.95) 5(1.3,0.95)
  silkscreen extent -1.5,-1.5 0.8,1.92, body extent -1.4,-1.45 1.4,1.45, height 1.45
SOT95P280X145-6N [mm]
  rect 1.2x0.55 smd: 1(-1.25,0.95) 2(-1.25,0) 3(-1.25,-0.95) 4(1.25,-0.95) 5(1.25,0) 6(1.25,0.95)
  silkscreen extent -2.3,-1.46 0.7,1.8, body extent -1.42,-1.46 1.42,1.46, height 1.1
SW_CJS-1200TA [mm]
  rect 1x1.6 smd: 1(-1.75,-1.15) 2(0,1.15) 3(1.75,-1.15)
  silkscreen extent -2.7,-2.46 2.7,1.25, body extent -2.7,-1.4 2.7,1.4, height 2.5
TP_c200 [mm] "TP SMD D.2mm"
  round 2 smd paste-5: 1(0,0)
  silkscreen extent -2,-2 2,2

## Part data
C1: Case=1206, Manufacturer=KEMET, PartNumber=C1206C225K5RAC, Voltage=50V
C2: Case=0606, Manufacturer=KEMET, PartNumber=C0603C104K5RACTU, Voltage=50V
C3 C4 C5 C6: Case=1206, Manufacturer=KEMET, PartNumber=C1206C106K4RAC7800, Voltage=16V
C7 C8: Case=0603, Manufacturer=KEMET, PartNumber=C0603C105K8RACTU, Voltage=10V
C9 C11 C12 C13 C15 C17 C18: library part CAP, Case=0603, Manufacturer=KEMET, Voltage=10V, SMD/PTH=SMD
  C9 C11 C12 C13 C17 C18: PartNumber=C0603C104K5RACTU
  C15: PartNumber=C0603C105K8RACTU
C10: library part CAP, Case=0603, Manufacturer=KEMET, Voltage=50V, PartNumber=C0603X473K5RAC3316, SMD/PTH=SMD
C14: library part CAP, Case=0603
C16: library part CAP, Case=1206, Manufacturer=KEMET, PartNumber=C1206C106K4RAC7800, Voltage=16V, SMD/PTH=SMD
D1 D2 D6: Case=SOD123, Manufacturer="Diodes Incorporated", PartNumber=1N5819HW-7-F
D3: library part Diode_TVS_Bid, Case=SMB-2, Manufacturer="Microchip Technology", PartNumber=SMBJ18CAe3/TR13, Voltage=18V
D4: "ESD Diode bid", Case=SOT23-3, Manufacturer=Onsemi, PartNumber=SZNUP2105LT1G, SMD/PTH=SMD
D5: "ESD Diode bid -7 to 12v", Case=SOT23-3, Manufacturer=Semtech, PartNumber=SM712.TCT
DL1 DL2: Case=0603, Manufacturer="Wurth Elektronik", PartNumber=150060GS75000
DL3: library part LED_Blue, Case=0603, Manufacturer="Wurth Elektronik", PartNumber=150060BS75000, SMD/PTH=SMD
DTR GND RTS RX TX: "Test Poin"
J1: "USB Connectors USB Type C,2.0, Rec,SMT, 0.95mmTH Shell Stakes,G/F,RA,Top Mnt,T&R", Case=USB-C, Manufacturer=GCT, PartNumber=USB4105-GF-A
J2: "Micro-Fit 3.0 Vertical Header, 3.00mm Pitch, Dual Row, 8 Circuits, with PCB Press-fit Metal Retention Clip, Glow-Wire Capable", Manufacturer=Molex, PartNumber=43045-0817
J3: "18 Position FFC, FPC Connector Contacts, Bottom 0.020\" (0.50mm) Surface Mount, Right Angle", Manufacturer=Molex, PartNumber=5051101892
L1: Case=SDE0805A, Manufacturer=BOURNS, PartNumber=SDE0805A-180M
L2 L3: library part IND, Case=0603, Manufacturer=TDK, PartNumber=MMZ1608Q331BTD25, SMD/PTH=SMD
Q1 Q2: library part TRAN_NMOS_3P, Case=SOT23-3, Manufacturer=Nexperia, PartNumber=NX7002AKVL, SMD/PTH=SMD
R1: library part Resistor, Case=0603, Manufacturer=Vishay, PartNumber=CRCW060388K7FKEAC
R2: library part Resistor, Case=0603, Manufacturer=Vishay, PartNumber=CRCW06031K30FKEAC
R3 R4: library part Resistor, Case=0603, Manufacturer=Vishay, PartNumber=CRCW060310K0JNEAC
R5: library part Resistor, Case=0603, Manufacturer=Vishay, PartNumber=CRCW060322K1FKEA
R6 R16: library part Resistor, Case=0603, Manufacturer=Vishay, PartNumber=CRCW0603560RJNEAC
  R16: SMD/PTH=SMD
R7 R12 R21 R22: library part Resistor, Case=0603, Manufacturer=Vishay, PartNumber=CRCW06030000Z0EE
R8 R9 R10 R11 R13 R14 R15 R17 R18 R23: library part Resistor, Case=0603, Manufacturer=Vishay
  R8: PartNumber=CRCW0603120RFKEA, SMD/PTH=SMD
  R9 R15 R17 R18 R23: PartNumber=CRCW060310K0FKEA, SMD/PTH=SMD
  R10 R14: PartNumber=CRCW060310K0FKEA
  R11 R13: PartNumber=CRCW060315K0FKEC
R19 R20: Case=0603, Manufacturer=Vishay, PartNumber=CRCW06035K10FKEC
SW1: library part SWITCH_SPDT, Manufacturer="Nidec Components", PartNumber=CJS-1200TA
U1: library part LV3842XDBVR, "4-V to 36-V, 600-mA synchronous step-down converter", Case=6-SOT-23, Manufacturer="Texas Instruments", PartNumber=LV3842XDBVR
U2: "LDO Voltage Regulators 500-mA high-PSRR low-IQ low-dropout voltage regulator with enable", Case=SOT-23-5, Manufacturer="Texas Instruments", PartNumber=TLV75533PDBVR
U3: library part TJA1051TK/3, "CAN HIGH-SPEED CAN TRANSCEIVER 3.3V / 5V Pin VIO", Case=HVSON-8, Manufacturer="NXP Semiconductors", PartNumber=TJA1051TK/3,118, SMD/PTH=SMD
U4: "Amp. op. One-channel, 1-MHz rail-to-rail input and output 1.8-V to 5.5-V operational amplifier 5-SOT-23 -40 to 125", Case=SOT23-5, Manufacturer="Texas Instrument", PartNumber=TLV9001IDBVR, SMD/PTH=SMD
U5: "ESP32 S3 WROOM 1", Manufacturer="Espressif Systems", PartNumber=ESP32-S3-WROOM-1-N8R8, SMD/PTH=SMD

## Free pads (board coordinates)
  round 4 hole 2.5 unplated: ""(-14.85,-14.85) ""(0,21) ""(14.85,-14.85)

## Via types
v1: diameter 0.63, hole 0.3, Top Layer to Bottom Layer, 96 vias

## Nets (pads, with @x,y where several pads share a name; then routed paths per layer and width w, separated by ;. In a path a pad name is that pad's centre, name@x,y a point inside that pad or via, vN(x,y) a via of type N, cw(c..) or ccw(c..) an arc to the next point about the centre after c; other vN are vias at no path point)
5V: C3.1 C4.1 C5.1 C6.1 C7.1 C9.1 C10.1 C12.1 C13.1 D2.C D6.C J2.2 R2.2 U2.1 U2.3 U3.3 U4.5 | length 27.4
  Top Layer w0.254: C7.1 18.325,8.307 18.673,7.959 18.711,7.959 18.919,7.751 18.919,7.674 19.142,7.451 20.867,7.451 21.016,7.6 U2.3
  Top Layer w0.381: R2.2 -22.29,-8.701 -21.429,-7.84 -19.016,-7.84 -16.51,-5.334 ; v1(-6.35,4.826) -5.694,5.482 -5.694,5.84 -5.409,6.125 C13.1 -3.615,6.125 U4.5
  Int2 w1: v1(-6.35,4.826) -5.715,4.191 -5.715,1.548 v1(-2.224,-1.943)
  Bottom Layer w0.381: D6.C -6.525,-20.65 -6.525,-19.733 v1(-6.477,-19.685)
  other v1: -15.786,-3.975 -14.986,-3.975 -15.786,-3.175 -14.986,-3.175 -1.524,-1.943 -0.824,-1.943 -2.224,-1.143 -1.524,-1.143 -0.824,-1.143 16.472,7.582 17.272,7.582 16.472,8.382 17.272,8.382
+3V3: C8.1 C11.1 C12.2 C16.1 C17.1 C18.1 J3.1 R6.2 R17.2 R23.2 U2.5 U3.5 U5.2 | length 14.9
  Top Layer w0.381: v1(-18.669,4.826) -18.093,4.25 J3.1 ; v1(6.985,10.033) 7.017,10.033 7.333,9.717 R17.2
  Top Layer w0.762: R6.2 16.956,17.197 17.025,17.128 17.1,17.128 18.739,15.489 18.739,14.572 C8.1
  Bottom Layer w0.381: R23.2 -12.498,-2.605 -10.462,-4.641 -10.462,-4.778 v1(-10.414,-4.826) ; v1(6.985,10.033) 7.408,9.61 U5.2
  Bottom Layer w0.762: U5.2 10.356,9.61 10.826,10.08 C16.1
  other v1: -17.691,-9.309 -16.891,-9.309 -17.691,-8.509 -16.891,-8.509 16.726,13.27 17.526,13.27 16.726,13.97 17.526,13.97 16.726,14.67 17.526,14.67
+12V: D1.A D3.2 J2.8
+12VPRT: C1.1 D1.C R7.1 U1.5 | length 1.7
  Top Layer w0.762: U1.5 17.059,-3.683 17.471,-4.095 17.471,-4.263 ; C1.1@18.931,-4.754 C1.1
Boot0: Q1.D U5.27 | length 20.4
  Top Layer w0.127: Q1.D -14.097,6.905 -13.81,6.618 -8.904,6.618 -6.35,4.064 -6.35,-4.445 -6.945,-5.04 -7.326,-5.04 v1(-7.366,-5.08)
  Bottom Layer w0.127: U5.27 -8.557,-5.437 -7.723,-5.437 v1(-7.366,-5.08)
CAN0_IC_N: L3.1 U3.6 | length 2.3
  Top Layer w0.1: L3.1 -13.331,-8.475 -13.008,-8.475 -12.949,-8.416 -12.949,-7.93 -12.822,-7.803 -12.822,-7.624 -12.881,-7.565 -12.9,-7.565 -13.025,-7.44 U3.6
CAN0_IC_P: L2.1 U3.7 | length 2.3
  Top Layer w0.1: U3.7 -12.375,-7.44 -12.5,-7.565 -12.519,-7.565 -12.577,-7.624 -12.577,-7.904 -12.704,-8.031 -12.704,-8.416 -12.646,-8.475 -12.323,-8.475 L2.1
CAN0_N: D4.1 J2.5 L3.2 SW1.1 | length 27.1
  Top Layer w0.1: L3.2 -13.331,-10.575 -13.011,-10.575 -12.952,-10.634 -12.952,-11.019 -10.319,-13.652 -10.319,-14.271 -10.113,-14.477 -9.927,-14.477 -9.868,-14.535 -9.868,-15.001 -9.568,-15.301 D4.1 -9.318,-15.301 -9.018,-15.001 -9.018,-14.535 -8.959,-14.477 -8.773,-14.477 -8.567,-14.271 -8.567,-14.197 -8.408,-14.038 -5.591,-14.038 -5.285,-13.732 -5.285,-13.121 -5.168,-13.004 -3.832,-13.004 -3.126,-13.711 -3.126,-13.98 -3.184,-14.038 -4.114,-14.038 J2.5 -3.184,-14.424 -3.126,-14.483 -3.126,-15.167 -3.903,-15.944 -5.36,-15.944 -5.789,-16.373 -7.084,-16.373 -7.84,-17.128 -7.84,-17.284 -9.045,-18.489 SW1.1
CAN0_P: D4.2 J2.6 L2.2 R8.1 | length 24.4
  Top Layer w0.1: L2.2 -12.323,-10.575 -12.643,-10.575 -12.701,-10.634 -12.701,-10.915 -10.068,-13.549 -10.068,-14.167 -10.009,-14.226 -9.927,-14.226 -9.868,-14.167 -9.868,-13.701 -9.568,-13.401 D4.2 -9.318,-13.401 -9.018,-13.701 -9.018,-14.167 -8.959,-14.226 -8.877,-14.226 -8.818,-14.167 -8.818,-14.093 -8.512,-13.787 -5.695,-13.787 -5.536,-13.629 -5.536,-13.017 -5.272,-12.753 -3.728,-12.753 -2.875,-13.607 -2.875,-13.98 -2.816,-14.038 -1.886,-14.038 J2.6 -2.816,-14.424 -2.875,-14.483 -2.875,-15.271 -3.799,-16.195 -5.256,-16.195 -5.685,-16.624 -6.098,-16.624 -6.157,-16.683 -6.157,-16.765 -6.086,-16.836 -6.011,-16.836 -5.523,-17.324 R8.1
DTR: DTR.1 Q1.S R18.2 | length 43.7
  Top Layer w0.127: R18.2 -16.943,10.857 -16.62,10.534 -16.62,10.459 -15.641,9.48 Q1.S -15.047,9.355 -14.76,9.068 -14.635,9.068 -14.045,8.478 -7.397,8.478 -7.366,8.509 -7.311,8.509 -7.057,8.763 v1(-6.985,8.763) ; v1(8.128,23.495) 8.13,23.497 9.597,23.497 DTR.1
  Int2 w0.254: v1(-6.985,8.763) -9.906,11.684 -9.906,18.288 -7.747,20.447 -6.35,20.447 -3.302,23.495 v1(8.128,23.495)
EN: C15.1 Q2.D R17.1 U5.3 | length 30.6
  Top Layer w0.127: Q2.D -12.585,13.683 -12.393,13.683 -12.319,13.609 -12.319,9.928 -11.535,9.144 -8.297,9.144 -6.167,11.274 3.204,11.274 3.937,10.541 3.937,9.562 4.72,8.779 4.72,8.704 5.132,8.292 C15.1 5.232,8.317 R17.1
  Bottom Layer w0.127: v1(6.731,8.382) 6.773,8.34 U5.3
GND: C1.2 C3.2 C4.2 C5.2 C6.2 C7.2 C8.2 C9.2 C10.2 C11.2 C13.2 C14.2 C15.2 C16.2 C17.2 C18.2 D3.1 D4.3 D5.3 DL1.C DL2.C DL3.C GND.1 J1.1 J1.2 J1.3 J1.4 J1.A1-B12 J1.B1-A12 J2.3 J2.4 J3.3 R4.1 R5.1 R9.1 R11.2 R14.1 R19.1 R20.1 U1.2 U2.2 U3.2 U3.9 U4.2 U5.1 U5.40 U5.41 U5.41_10 U5.41_11 U5.41_12 U5.41_13 U5.41_14 U5.41_15 U5.41_16 U5.41_17 U5.41_18 U5.41_19 U5.41_20 U5.41_21 | length 58.6
  Top Layer w0.381: v1(-23.622,-11.811) -23.368,-12.065 DL1.C ; v1(-18.796,3.429) -18.729,3.429 -18.55,3.25 J3.3 ; v1(-13.462,17.526) -13.456,17.532 -13.456,18.79 DL3.C ; v1(-12.065,22.987) -11.178,22.987 -10.975,23.19 -9.957,23.19 -9.647,23.5 GND.1 ; v1(-6.604,10.16) -6.35,10.16 -6.088,9.898 R11.2 -5.334,9.836 C13.2 ; U4.2 -0.062,7.104 0.554,7.72 0.554,7.795 0.814,8.055 R14.1 ; R14.1@1.054,7.964 1.224,7.795 1.224,7.587 1.524,7.286 v1(1.524,7.239) ; C14.2 v1(2.667,10.795) ; v1(7.747,-24.638) D5.3 ; v1(10.922,18.034) 11.43,17.526 DL2.C
  Top Layer w0.508: v1(-15.748,-11.303) -15.748,-11.27 -15.621,-11.143 C11.2 ; v1(-12.319,-6.134) -11.962,-5.777 R9.1 ; v1(-12.319,-5.334) -12.375,-5.278 U3.2 -12.375,-3.612 -11.942,-3.179 -11.942,-2.761 C10.2 C9.2 -11.721,-0.837 -11.5,-1.058 -10.532,-1.058 -10.193,-1.397 v1(-10.16,-1.397) ; v1(-12.192,-13.462) -12.192,-13.495 -12.114,-13.573 -12.114,-14.255 -12.018,-14.351 D4.3 ; C15.2 v1(5.207,10.922)
  Top Layer w0.762: C7.2 19.775,8.457 20.066,8.748 U2.2
  Int1 w0.508: U5.41_15 0.8,2.46 U5.41_19 0.8,3.86 ; U5.41_12 0.8,3.86 ; U5.41_21 U5.41_14 ; U5.41_17 0.8,3.86 ; U5.41_10 2.2,3.86 ; U5.41_20 U5.41_18 U5.41_13 ; U5.41_16 2.2,3.86 ; U5.41_11 2.2,3.86
  Bottom Layer w0.381: U5.40 -8.629,11.001 -7.414,11.001 v1(-7.366,11.049) ; J1.2 -4.32,-19.619 -4.034,-19.333 -3.668,-19.333 -3.113,-18.778 R20.1 ; R19.1 3.24,-19.37 J1.A1-B12 3.2,-19.634 3.31,-19.744 4.079,-19.744 J1.1
  Bottom Layer w0.508: U5.41@0.1,1.76 U5.41_15 U5.41@0.1,3.16 ; U5.41_12 U5.41@0.1,4.56 ; U5.41_21 1.5,1.76 U5.41_20 U5.41@2.9,1.76 ; U5.41_19 1.5,3.16 U5.41_14 ; U5.41_17 1.5,4.56 U5.41_10 ; U5.41_18 U5.41@2.9,3.16 ; U5.41_16 2.9,4.56 U5.41_11
  other v1: 20.663,-8.547 21.463,-8.547 20.663,-7.747 21.463,-7.747 -13.119,-6.134 -13.119,-5.334 6.223,-5.272 7.023,-5.272 6.223,-4.572 7.023,-4.572 6.223,-3.872 7.023,-3.872 16.383,9.779 17.018,10.414 17.653,11.049 21.552,14.186 22.352,14.186 21.552,14.986 22.352,14.986
IGNITION: J2.7 R3.1 R7.2 | length 32.7
  Top Layer w0.254: J2.7 1.5,-12.47 v1(1.905,-12.065) ; v1(14.224,-9.652) 14.852,-9.024 14.852,-8.832 R3.1 ; v1(24.384,-6.477) 24.758,-6.103 25.077,-6.103 R7.2
  Int2 w0.254: v1(1.905,-12.065) 13.843,-12.065 14.224,-11.684 v1(14.224,-9.652) 14.224,-7.366 15.113,-6.477 v1(24.384,-6.477)
LD_STATUS: R16.2 U5.5 | length 25.3
  Top Layer w0.127: v1(-11.083,9.652) -11.083,10.823 R16.2
  Bottom Layer w0.127: v1(-11.083,9.652) -11.083,10.888 -10.16,11.811 -1.143,11.811 4.035,6.633 7.616,6.633 8.45,5.8 U5.5
MCU_CAN0_RX: U3.4 U5.24 | length 14.7
  Top Layer w0.127: v1(-14.097,-3.937) -13.787,-3.937 -13.675,-4.049 U3.4
  Bottom Layer w0.127: v1(-14.097,-3.937) -14.097,-7.493 -13.589,-8.001 -5.266,-8.001 -4.445,-7.18 U5.24
MCU_CAN0_TX: U3.1 U5.25 | length 11.6
  Top Layer w0.127: U3.1 -9.755,-4.215 -8.411,-5.559 -6.17,-5.559 -5.715,-5.104 v1(-5.715,-3.556)
  Bottom Layer w0.127: U5.25 v1(-5.715,-3.556)
MCU_GPIO38: R21.1 U5.31 | length 11.5
  Top Layer w0.127: R21.1 -7.812,2.097 -7.239,1.524 v1(-7.239,-0.508)
  Bottom Layer w0.127: U5.31 -7.281,-0.55 v1(-7.239,-0.508)
MCU_GPIO45: R22.1 U5.26 | length 14.3
  Top Layer w0.127: R22.1 -14.76,-0.471 -14.476,-0.471 -14.351,-0.346 -14.351,-0.254 -14.097,0 -9.017,0 -7.366,-1.651 v1(-7.366,-3.683)
  Bottom Layer w0.127: v1(-7.366,-3.683) -7.366,-3.819 -6.858,-4.327 -6.858,-6.753 U5.26
MCU_LCD_BL: J3.2 U5.6 | length 30.1
  Top Layer w0.127: J3.2 -16.358,3.75 -16.044,4.064 -7.493,4.064 v1(-6.985,3.556)
  Bottom Layer w0.127: v1(-6.985,3.556) -6.985,1.524 -6.35,0.889 4.809,0.889 8.45,4.53 U5.6
MCU_LCD_CS: J3.9 R23.1 U5.32 | length 12.5
  Top Layer w0.127: v1(-18.542,0) -18.415,0 -18.165,0.25 J3.9
  Bottom Layer w0.127: v1(-18.542,0) -17.337,-1.205 R23.1 -11.035,-1.205 -10.113,-0.283 -10.054,-0.283 -9.05,0.72 U5.32
MCU_LCD_DC: J3.7 U5.34 | length 12.3
  Top Layer w0.127: v1(-18.669,1.524) -18.617,1.524 -18.343,1.25 J3.7
  Bottom Layer w0.127: v1(-18.669,1.524) -18.579,1.434 -11.266,1.434 -9.616,3.084 -8.926,3.084 U5.34
MCU_LCD_MISO: J3.6 U5.35 | length 9.6
  Top Layer w0.127: J3.6 -16.279,1.75 -16.252,1.777 ; -16.251,1.777 -16.089,1.939 v1(-15.953,1.939)
  Bottom Layer w0.127: v1(-15.953,1.939) -15.86,2.032 -11.938,2.032 -9.616,4.354 -8.926,4.354 U5.35
MCU_LCD_MOSI: J3.5 U5.38 | length 14
  Top Layer w0.127: v1@-18.669,2.54 v1(-18.669,2.413) -18.533,2.413 -18.37,2.25 J3.5
  Bottom Layer w0.127: v1(-18.669,2.413) -16.129,2.413 -10.202,8.34 U5.38
MCU_LCD_RST: J3.8 U5.33 | length 11.9
  Top Layer w0.127: v1(-18.69,0.742) -18.683,0.75 J3.8
  Bottom Layer w0.127: v1(-18.69,0.742) -10.561,0.742 -9.616,1.687 -9.053,1.687 U5.33
MCU_LCD_SCLK: J3.4 U5.39 | length 11.5
  Top Layer w0.127: J3.4 -16.309,2.75 -15.919,3.14 -15.919,3.512 v1(-15.875,3.556)
  Bottom Layer w0.127: v1(-15.875,3.556) -9.821,9.61 U5.39
MCU_SENS1: C14.1 R12.2 U5.4 | length 9
  Top Layer w0.127: R12.2 2.105,6.223 2.645,6.223 2.794,6.372 2.794,7.903 C14.1 3.654,8.03 4.572,7.112 v1(6.858,7.112)
  Bottom Layer w0.127: v1(6.858,7.112) 8.708,7.112 U5.4
MCU_USBD_N: D5.2 J1.A7 J1.B7 U5.14 | length 31.9
  Top Layer w0.205: v1(6.731,-19.812) 6.797,-19.878 D5.2
  Bottom Layer w0.2: J1.A7 -0.25,-20.33 -0.133,-20.447 0.633,-20.447 0.75,-20.33 J1.B7 0.7,-19.36 0.7,-18.863 0.655,-18.818 0.655,-18.571 1.19,-18.036 1.19,-17.045 2.106,-16.129 3.908,-16.129 5.606,-17.827 5.606,-17.958 6.731,-19.083 v1(6.731,-19.812) 7.138,-19.405 7.304,-19.405 7.399,-19.501 7.822,-19.501 8.618,-18.705 8.618,-17.827 9.779,-16.666 9.779,-8.946 7.945,-7.112 7.945,-6.097 8.062,-5.98 8.4,-5.98 U5.14
MCU_USBD_P: D5.1 J1.A6 J1.B6 U5.13 | length 34.4
  Top Layer w0.205: v1(7.493,-18.415) 8.697,-19.619 D5.1
  Bottom Layer w0.2: J1.B6 -0.75,-18.405 -0.633,-18.288 0.19,-18.288 0.345,-18.443 ; J1.A6 0.3,-19.36 0.3,-18.863 0.345,-18.818 0.345,-18.443 ; v1(7.493,-18.415) v1@7.411,-18.497 ; U5.13 8.45,-4.36 8.1,-4.71 8.1,-4.797 7.635,-5.262 7.635,-7.24 9.469,-9.074 9.469,-16.537 8.308,-17.698 8.308,-18.576 7.694,-19.191 7.528,-19.191 7.411,-19.074 v1@7.411,-18.497 ; 0.345,-18.443 0.88,-17.908 0.88,-16.917 1.978,-15.819 4.037,-15.819 5.916,-17.698 5.916,-17.83 6.914,-18.828 7.08,-18.828 v1@7.411,-18.497
NetC2_1: C2.1 U1.1 | length 2.6
  Top Layer w0.762: U1.1 13.736,-1.287 14.346,-0.677 14.421,-0.677 14.515,-0.583 C2.1
NetC2_2: C2.2 L1.1 U1.6
NetD2_A: D2.A L1.2 R1.2 | length 21.9
  Top Layer w0.254: v1(11.43,-9.271) R1.2
  Bottom Layer w0.254: v1(11.43,-9.271) 11.43,-6.858 24.003,5.715 v1(24.003,6.223)
NetD6_A: D6.A J1.A4-B9 J1.B4-A9 | length 3.5
  Bottom Layer w0.4: J1.B4-A9 -2.3,-19.51 -2.3,-20.191 -2.159,-20.332 -2.159,-21.082 ; 2.286,-21.082 2.286,-20.765 2.265,-20.744 2.265,-20.226 2.3,-20.191 2.3,-19.51 J1.A4-B9
NetDL1_A: DL1.A R2.1 | length 2.1
  Top Layer w0.381: R2.1 -20.89,-12.015 DL1.A
NetDL2_A: DL2.A R6.1 | length 1.8
  Top Layer w0.381: DL2.A 14.085,17.272 R6.1
NetDL3_A: DL3.A R16.1 | length 6.8
  Top Layer w0.127: DL3.A -11.176,18.022 -11.176,12.638 R16.1
NetJ1_A5: J1.A5 R19.2 | length 2
  Bottom Layer w0.127: J1.A5 1.25,-18.985 1.409,-18.825 1.409,-18.756 1.51,-18.655 1.51,-17.983 R19.2
NetJ1_B5: J1.B5 R20.2 | length 1.8
  Bottom Layer w0.127: J1.B5 -1.75,-17.69 R20.2
NetJ3_10: J3.10 R21.2 | length 2.7
  Top Layer w0.127: J3.10 -15.933,-0.25 -15.448,0.236 -15.448,0.31 -15.061,0.697 R21.2
NetJ3_11: J3.11 R22.2 | length 3.1
  Top Layer w0.127: J3.11 -16.568,-0.75 -16.256,-1.062 -16.256,-1.778 -15.81,-2.224 R22.2
NetQ1_G: Q1.G R15.1 | length 1.7
  Top Layer w0.127: R15.1 -13.147,11.053 Q1.G
NetQ2_G: Q2.G R18.1 | length 4.1
  Top Layer w0.127: R18.1 -17.018,14.478 -16.576,14.92 Q2.G
NetR1_1: R1.1 R5.2 U1.3 | length 4.1
  Top Layer w0.254: R1.1 R5.2 12.97,-5.399 13.283,-5.086 13.283,-4.781 13.431,-4.633 U1.3
NetR3_2: R3.2 R4.2 U1.4 | length 4.1
  Top Layer w0.254: U1.4 16.427,-4.633 16.575,-4.781 R3.2
NetR8_2: R8.2 SW1.2 | length 6.8
  Top Layer w0.127: SW1.2 -8.262,-21.089 -7.874,-20.701 -7.874,-18.35 -7.384,-17.861 -7.31,-17.861 -6.923,-17.474 R8.2
NetR9_2: R9.2 U3.8 | length 1.7
  Top Layer w0.127: U3.8 -10.071,-7.215 R9.2
NetR10_1: R10.1 R12.1 U4.1 | length 3.7
  Top Layer w0.127: R10.1 -1.459,4.393 -0.986,4.866 U4.1 0.636,6.154 R12.1
NetR10_2: R10.2 R11.1 U4.4 | length 6.3
  Top Layer w0.127: R11.1 -3.872,8.29 -3.635,8.054 U4.4 -3.586,7.634 -2.472,6.521 -2.472,4.705 R10.2
NetR13_2: R13.2 R14.2 U4.3 | length 3.9
  Top Layer w0.127: U4.3 -0.951,8.089 R13.2 0.363,9.906 0.814,9.455 R14.2
RTS: Q2.S R15.2 RTS.1 | length 19.7
  Top Layer w0.127: R15.2 -14.67,12.493 -15.197,13.02 Q2.S -14.548,13.02 -14.36,13.208 v1(-14.224,13.208) ; v1(-6.477,24.003) -6.381,24.099 -5.101,24.099 RTS.1
  Int2 w0.254: v1(-14.224,13.208) -14.199,13.208 -12.573,14.834 -12.573,18.669 -7.239,24.003 v1(-6.477,24.003)
RX: RX.1 U5.37 | length 31.2
  Top Layer w0.127: v1(3.302,24.511) 3.358,24.455 4.745,24.455 RX.1
  Int2 w0.254: v1(-10.541,7.239) -10.541,18.923 -8.418,21.046 -6.894,21.046 -3.429,24.511 v1(3.302,24.511)
  Bottom Layer w0.127: v1(-10.541,7.239) -8.919,7.239 U5.37
S1_IN: J2.1 R13.1 | length 15.9
  Top Layer w0.127: J2.1 -4.5,2.739 v1(-4.064,3.175) ; R13.1 -2.286,9.841 v1(-2.286,8.763)
  Bottom Layer w0.127: v1(-4.064,3.175) -2.286,4.953 v1(-2.286,8.763)
TX: TX.1 U5.36 | length 30.1
  Top Layer w0.127: v1(-1.524,25.146) -1.447,25.223 -0.077,25.223 TX.1
  Int2 w0.254: v1(-11.303,5.842) -11.811,6.35 -11.811,18.542 -7.239,23.114 -5.715,23.114 -3.683,25.146 v1(-1.524,25.146)
  Bottom Layer w0.127: v1(-11.303,5.842) -8.792,5.842 U5.36
pads on no net: J1. J1.A8 J1.B8 J2.9 J2.10 J3.12 J3.13 J3.14 J3.15 J3.16 J3.17 J3.18 J3.P1 J3.P2 SW1.3 U2.4 U5.7 U5.8 U5.9 U5.10 U5.11 U5.12 U5.15 U5.16 U5.17 U5.18 U5.19 U5.20 U5.21 U5.22 U5.23 U5.28 U5.29 U5.30

## Polygon pours and split planes (outlines as drawn)
+3V3 on Top Layer "NONET_L-01_P-001" (solid, pour order 10): -16.495,-7.725 -16.898,-8.128 -18.146,-8.128 -18.288,-8.27 -18.288,-9.525 -18.034,-9.779 -14.971,-9.779 -14.463,-9.271 -14.463,-8.001 -14.209,-7.747 -13.447,-7.747 -13.447,-6.731 -13.32,-6.604 -14.209,-6.604 -14.336,-6.477 -14.336,-5.969 -14.463,-5.842 -15.86,-5.842 -16.495,-6.477
5V on Top Layer "5V_L01_P019" (solid, pour order 19): -12.7,-0.127 -12.7,-4.699 -12.827,-4.572 -13.589,-4.572 -13.589,-4.699 -14.859,-5.969 -17.018,-5.969 -17.018,-3.81 -13.335,-0.127
5V on Top Layer "NONET_L-01_P-001" (solid, pour order 11): -2.794,-0.889 -2.54,-0.635 -0.508,-0.635 -0.254,-0.889 -0.254,-7.366 -2.794,-7.366
+12VPRT on Top Layer "NONET_L-01_P-001" (solid, pour order 3): 24.892,-5.334 26.416,-5.334 26.543,-5.207 26.543,-3.683 26.122,-3.262 24.09,-3.262 16.978,-3.262 15.382,-3.262 15.382,-4.212 15.769,-4.212 17.653,-6.096 24.13,-6.096
+12V on Top Layer "NONET_L-01_P-001" (solid, remove dead copper, pour order 4): 2.794,-12.827 3.175,-12.446 21.082,-12.446 21.971,-11.557 21.971,-6.985 26.625,-6.985 25.796,-9.53 24.647,-12.197 23.082,-14.948 21.133,-17.596 19.641,-19.248 10.485,-19.248 7.62,-16.383 3.175,-16.383 2.794,-16.002
GND on Top Layer "NONET_L-01_P-001" (solid, remove dead copper, pour order 2): 9.779,9.144 11.176,10.541 16.129,10.541 17.526,11.938 19.685,11.938 19.685,15.367 19.812,15.494 22.733,15.494 22.987,15.095 22.987,13.97 22.606,13.589 21.209,13.589 20.462,12.842 20.462,10.399 21.844,9.017 19.685,6.858 19.08,6.858 19.05,6.888 19.05,9.144 17.638,9.144 17.596,9.186 16.157,7.747 10.922,7.747 10.922,5.729 11.008,5.643 13.716,5.643 13.716,-3.175 14.541,-3.175 16.447,-5.08 16.51,-5.08 17.653,-6.223 20.701,-6.223 21.971,-7.493 21.971,-12.192 4.572,-12.192 -0.254,-7.366 -0.254,-3.683 0.444,-2.985 8.318,-2.985 9.779,-1.524 9.779,5.334
+3V3 on Top Layer "NONET_L-01_P-001" (solid, pour order 6): 16.256,12.827 16.891,12.192 19.685,12.192 19.685,15.367 19.812,15.494 16.764,15.494 16.256,14.986
5V on Top Layer "NONET_L-01_P-001" (solid, pour order 0): 15.24,7.747 18.288,10.795 19.685,10.795 19.685,9.398 19.304,9.017 19.304,7.874 16.383,4.953 16.383,1.397 15.367,0.381 13.716,0.381 13.716,5.643 11.008,5.643 10.922,5.729 10.922,7.747
NetD2_A on Top Layer "NONET_L-01_P-001" (solid, pour order 5): 17.272,1.651 26.289,1.651 26.289,5.715 25.146,6.858 18.034,6.858 17.272,6.096
NetC2_2 on Top Layer "NONET_L-01_P-001" (solid, pour order 1): 15.486,-2.204 15.486,0.119 16.51,1.143 26.035,1.143 26.289,0.889 26.289,-3.302 15.422,-3.302 15.382,-3.262 15.486,-3.158
+3V3 on Bottom Layer "NONET_L-01_P-001" (solid, pour order 7): 8.001,9.017 14.986,9.017 18.288,12.319 18.288,15.367 18.161,15.494 16.764,15.494 16.256,14.986 16.256,12.446 13.208,12.446 11.811,11.049 10.414,11.049 10.033,10.668 10.033,10.287 8.001,10.287
NetD6_A on Bottom Layer "NONET_L-01_P-001" (solid, pour order 12): -5.397,-25.781 -5.207,-25.59 -5.207,-23.368 -3.937,-23.368 -2.413,-21.844 1.905,-21.844 2.667,-21.082 2.667,-18.669 2.032,-18.669 2.032,-20.701 1.905,-20.828 -1.778,-20.828 -1.778,-18.669 -2.794,-18.669 -2.794,-20.447 -5.017,-22.67 -6.795,-22.67 -7.493,-23.368 -7.493,-25.146 -6.858,-25.781
GND on Bottom Layer "NONET_L-01_P-001" (solid, pour order 8): 8.001,10.287 9.652,10.287 10.414,11.049 11.811,11.049 13.081,12.319 16.002,12.319 16.256,12.573 16.256,14.986 16.764,15.494 20.701,15.494 20.955,15.24 20.955,13.589 22.606,13.589 22.987,13.97 22.987,15.252 22.516,15.723 22.516,15.872 22.225,16.162 22.225,16.256 21.971,16.51 12.827,16.51 8.001,11.684
GND on Int1 "GND_L02_P014" (solid, pour order 14): 0.07,27.5 cw(c0.023,0.091) 27.432,0.068 27.432,-0.068 cw(c0.068,-0.068) 0.068,-27.432 -0.186,-27.432 cw(c-0.186,-0.059) -27.559,-0.059 cw(c0,-0.059) 0,27.5
5V on Int2 "5V_L03_P018" (solid, pour order 18): -13.97,-3.81 -14.732,-4.572 -16.256,-4.572 -16.51,-4.318 -16.51,-2.921 -16.256,-2.667 -15.24,-2.667 -14.351,-1.778 -14.351,-1.016 -13.97,-0.635 -2.857,-0.635 -2.985,-3.429 -13.97,-3.429
+3V3 on Int2 "+3V3_L03_P020" (solid, pour order 20): 0.07,27.5 cw(c0.023,0.091) 27.432,0.068 27.432,-0.068 cw(c0.068,-0.068) 0.068,-27.432 -0.186,-27.432 cw(c-0.186,-0.059) -27.559,-0.059 cw(c0,-0.059) 0,27.5
5V on Int2 "5V_L03_P015" (solid, pour order 15): 13.589,8.89 4.064,-0.635 -3.175,-0.635 -3.683,-1.143 -3.683,-3.048 -3.302,-3.429 4.445,-3.429 14.351,6.477 17.653,6.477 18.161,6.985 18.161,8.636 17.907,8.89
5V on Int2 "5V_L03_P016" (solid, pour order 16): -7.112,-20.828 -7.493,-20.447 -7.493,-17.399 -3.683,-13.589 -3.683,-2.572 -1.778,-3.048 -2.54,-3.81 -2.54,-14.097 -5.588,-17.145 -5.588,-20.447 -5.969,-20.828

## Silkscreen, mask and mechanical layers (free items; w line width, h text height)
Top Overlay:
  drawing of 45 lines, arcs and shapes, not listed
  text "STATUS" at -18.542,18.415 h0.76
  text "3V3" at 12.192,18.288 h0.76
  text "NR" at 2.622,16.656 h1
  text "DEVELOPMENTS" at -2.178,15.056 h1
  text "CAN_GAUGE V1" at -4.317,0.254 h0.76
  text "S1-5V-GND-GND" at -5.015,-3.302 h0.76
  text "5V" at -20.066,-12.319 h0.76
  text "CANL-CANH-IGN-12V" at -6.858,-16.764 h0.76
  text "R-Can" at -18.215,-18.342 h1
  text "FOR RACING USE ONLY" at -7.493,-26.416 h0.76
Mechanical 1:
  circle w0.1: c0,0 r27.5

## Text inside footprints (layer, text, board x,y; h text height)
U5: Bottom Assembly "ANTENNA" at 4.5,15.12 h1.27